# Altium PCB Anten-Tracker-PCB.PcbDoc
Units mm, origin at the board's own origin, x right, y up, seen from the top; angles counter-clockwise.
Board outline 70 x 70 mm, 4 copper layers (SIG/GND, POWER, GND, SIG/POW), stack 1.564 mm thick; 105 components, 76 nets, 398 pads, 175 vias.
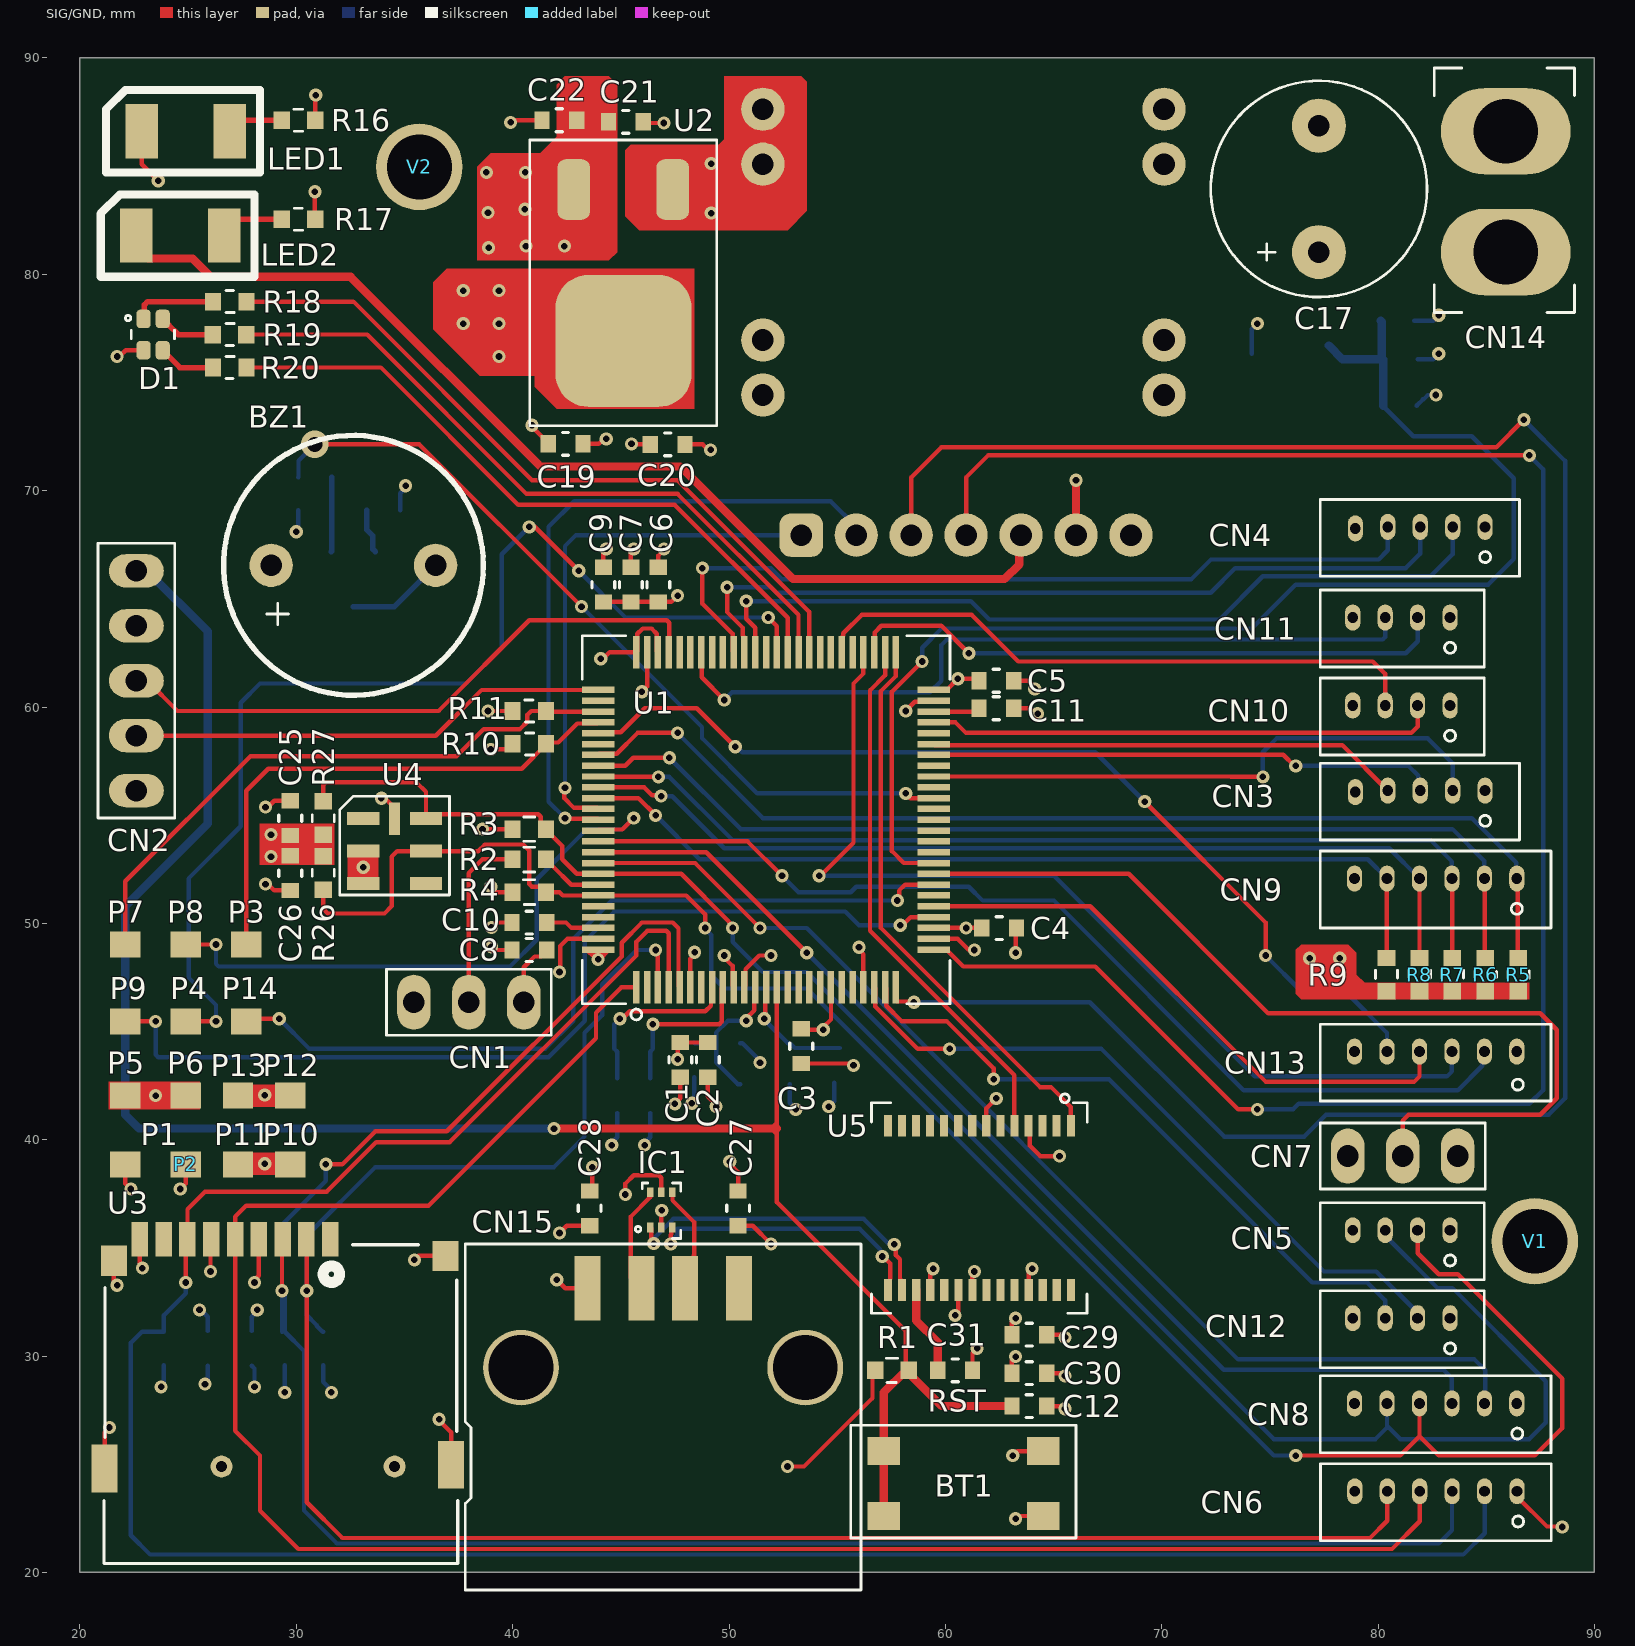
[diagram p0: SIG/GND view]
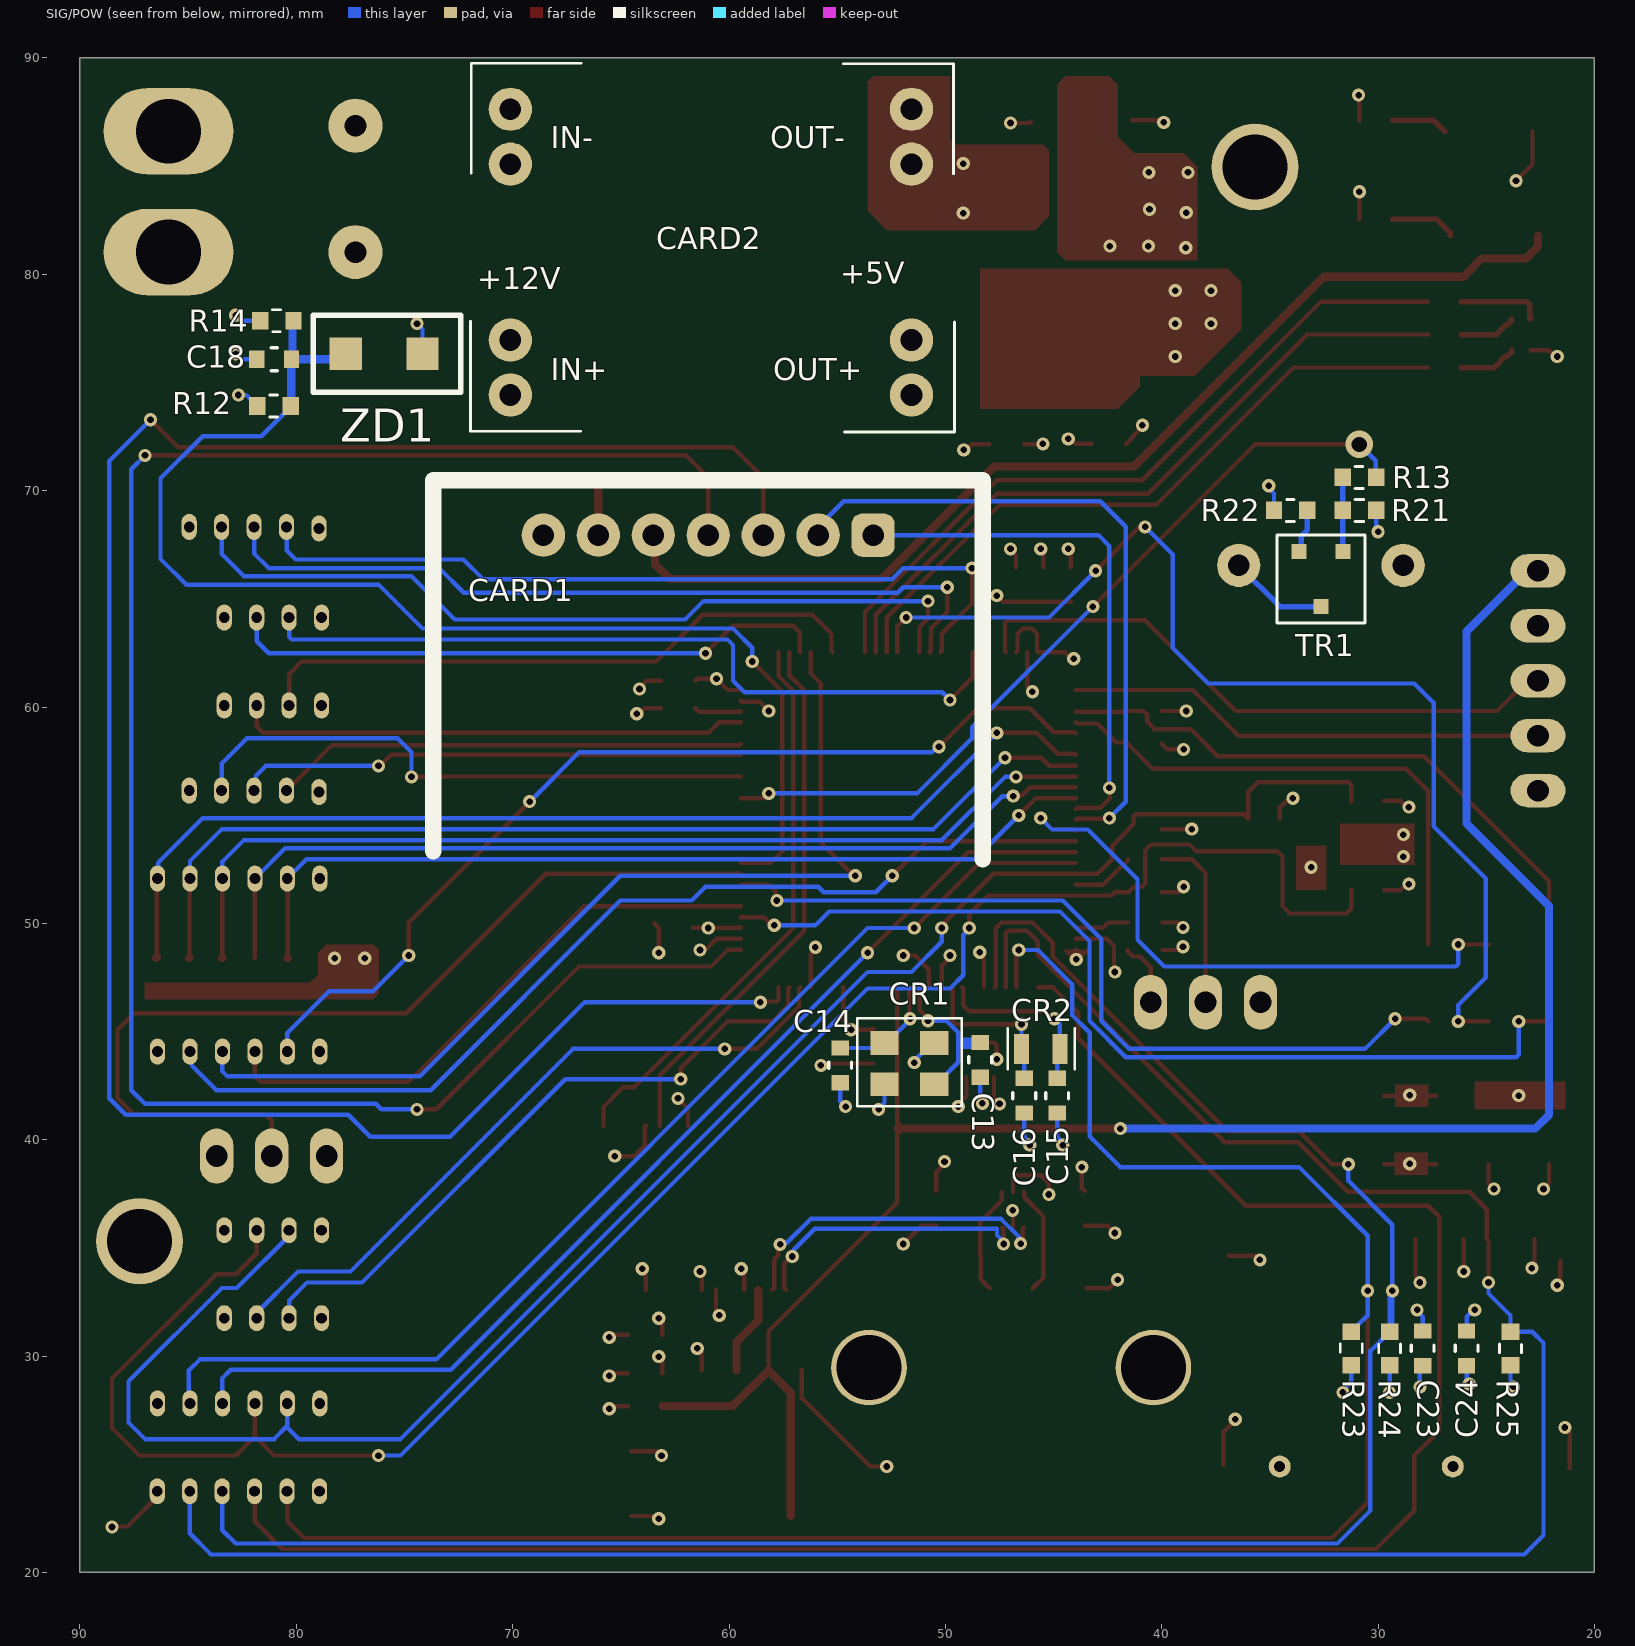
[diagram p1: SIG/POW view, seen from below]
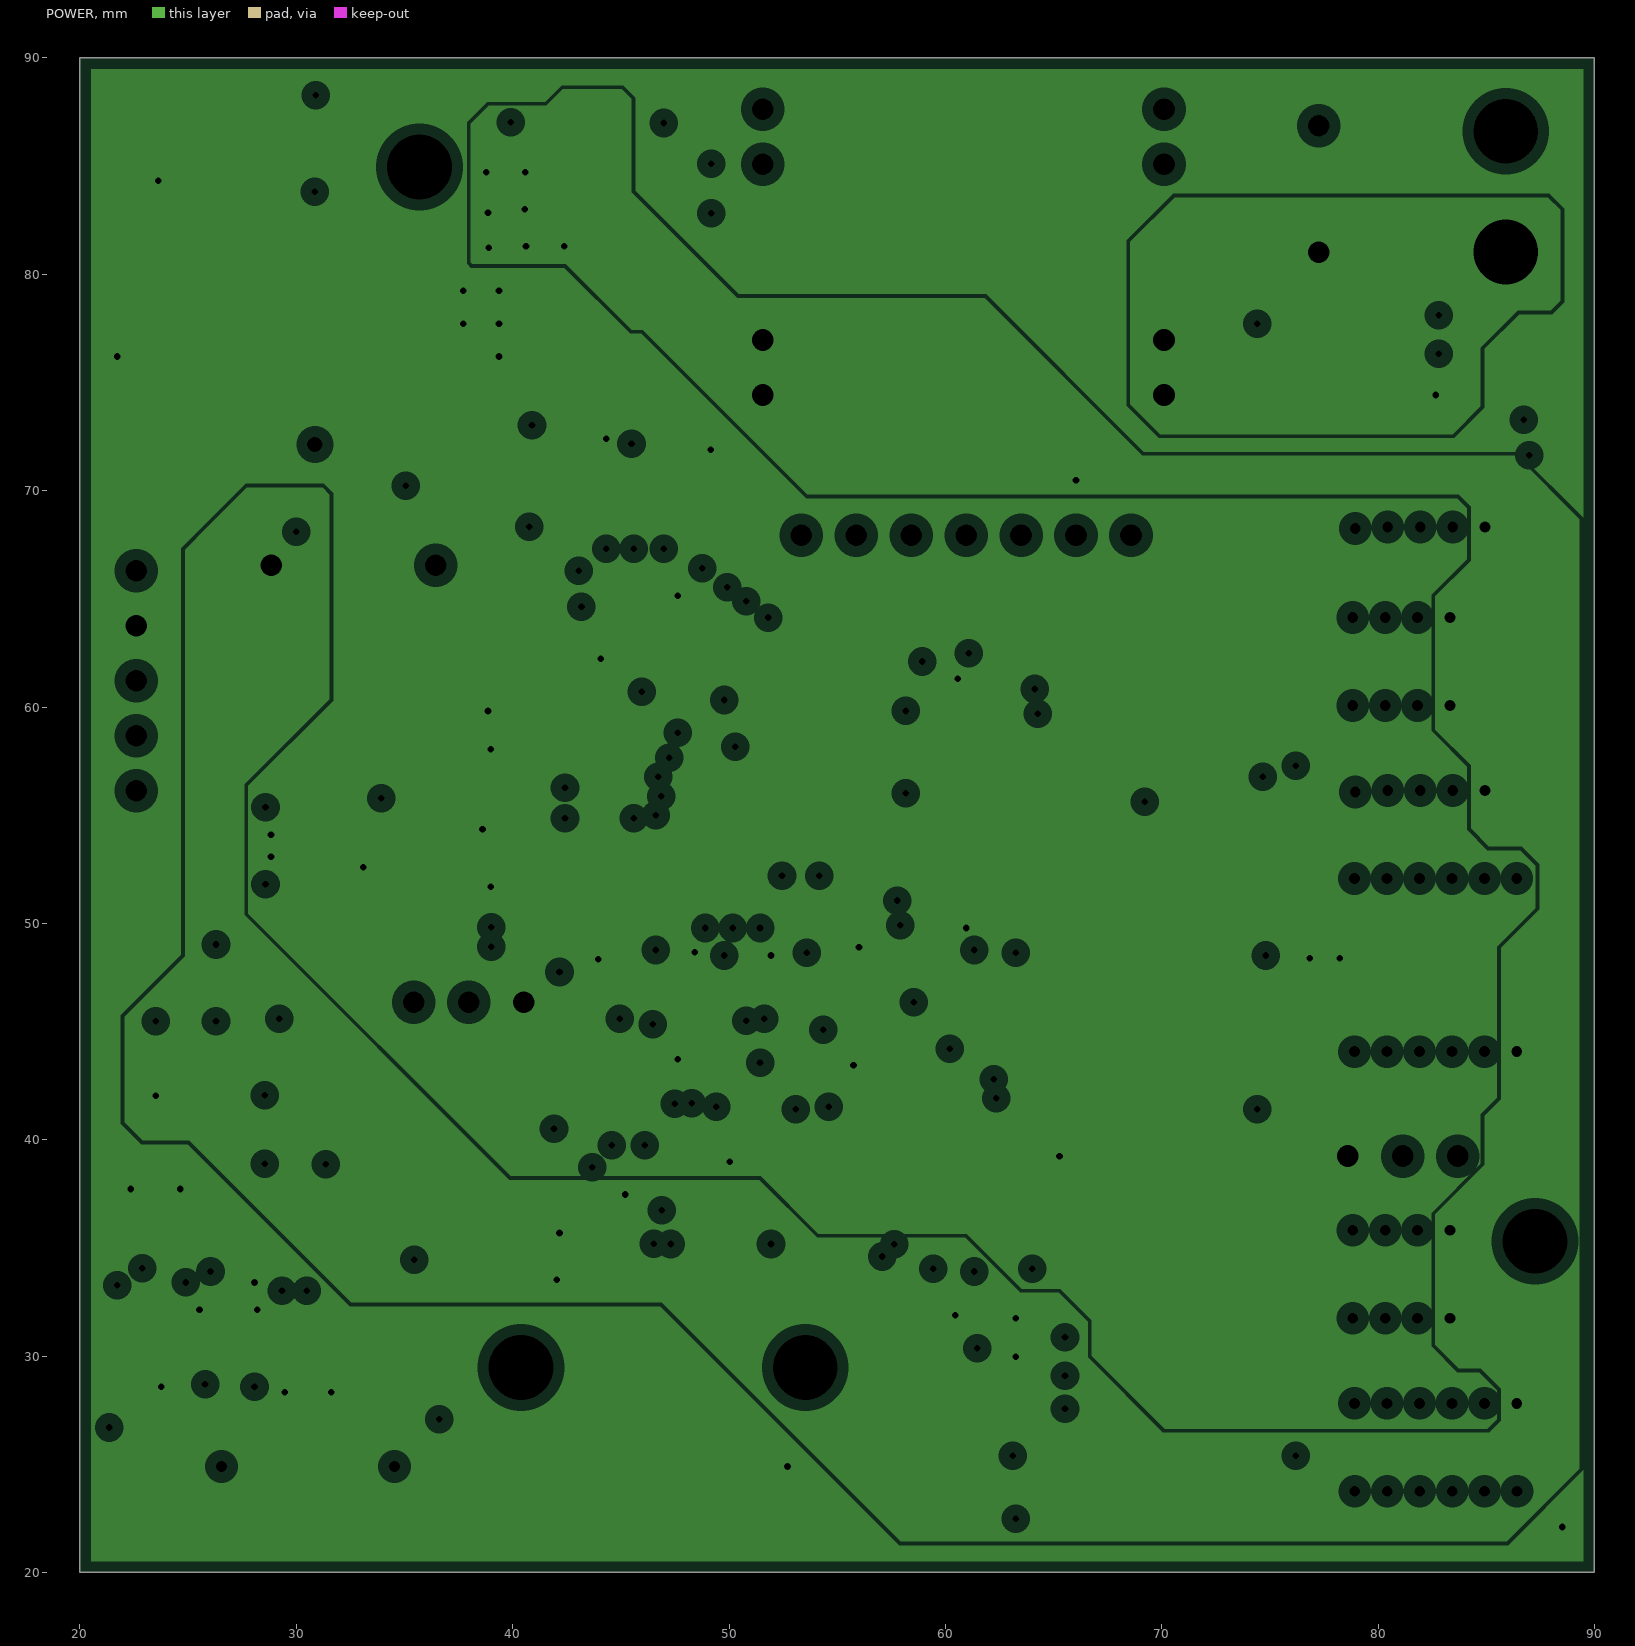
[diagram p2: POWER, clearances drawn from the general rule]
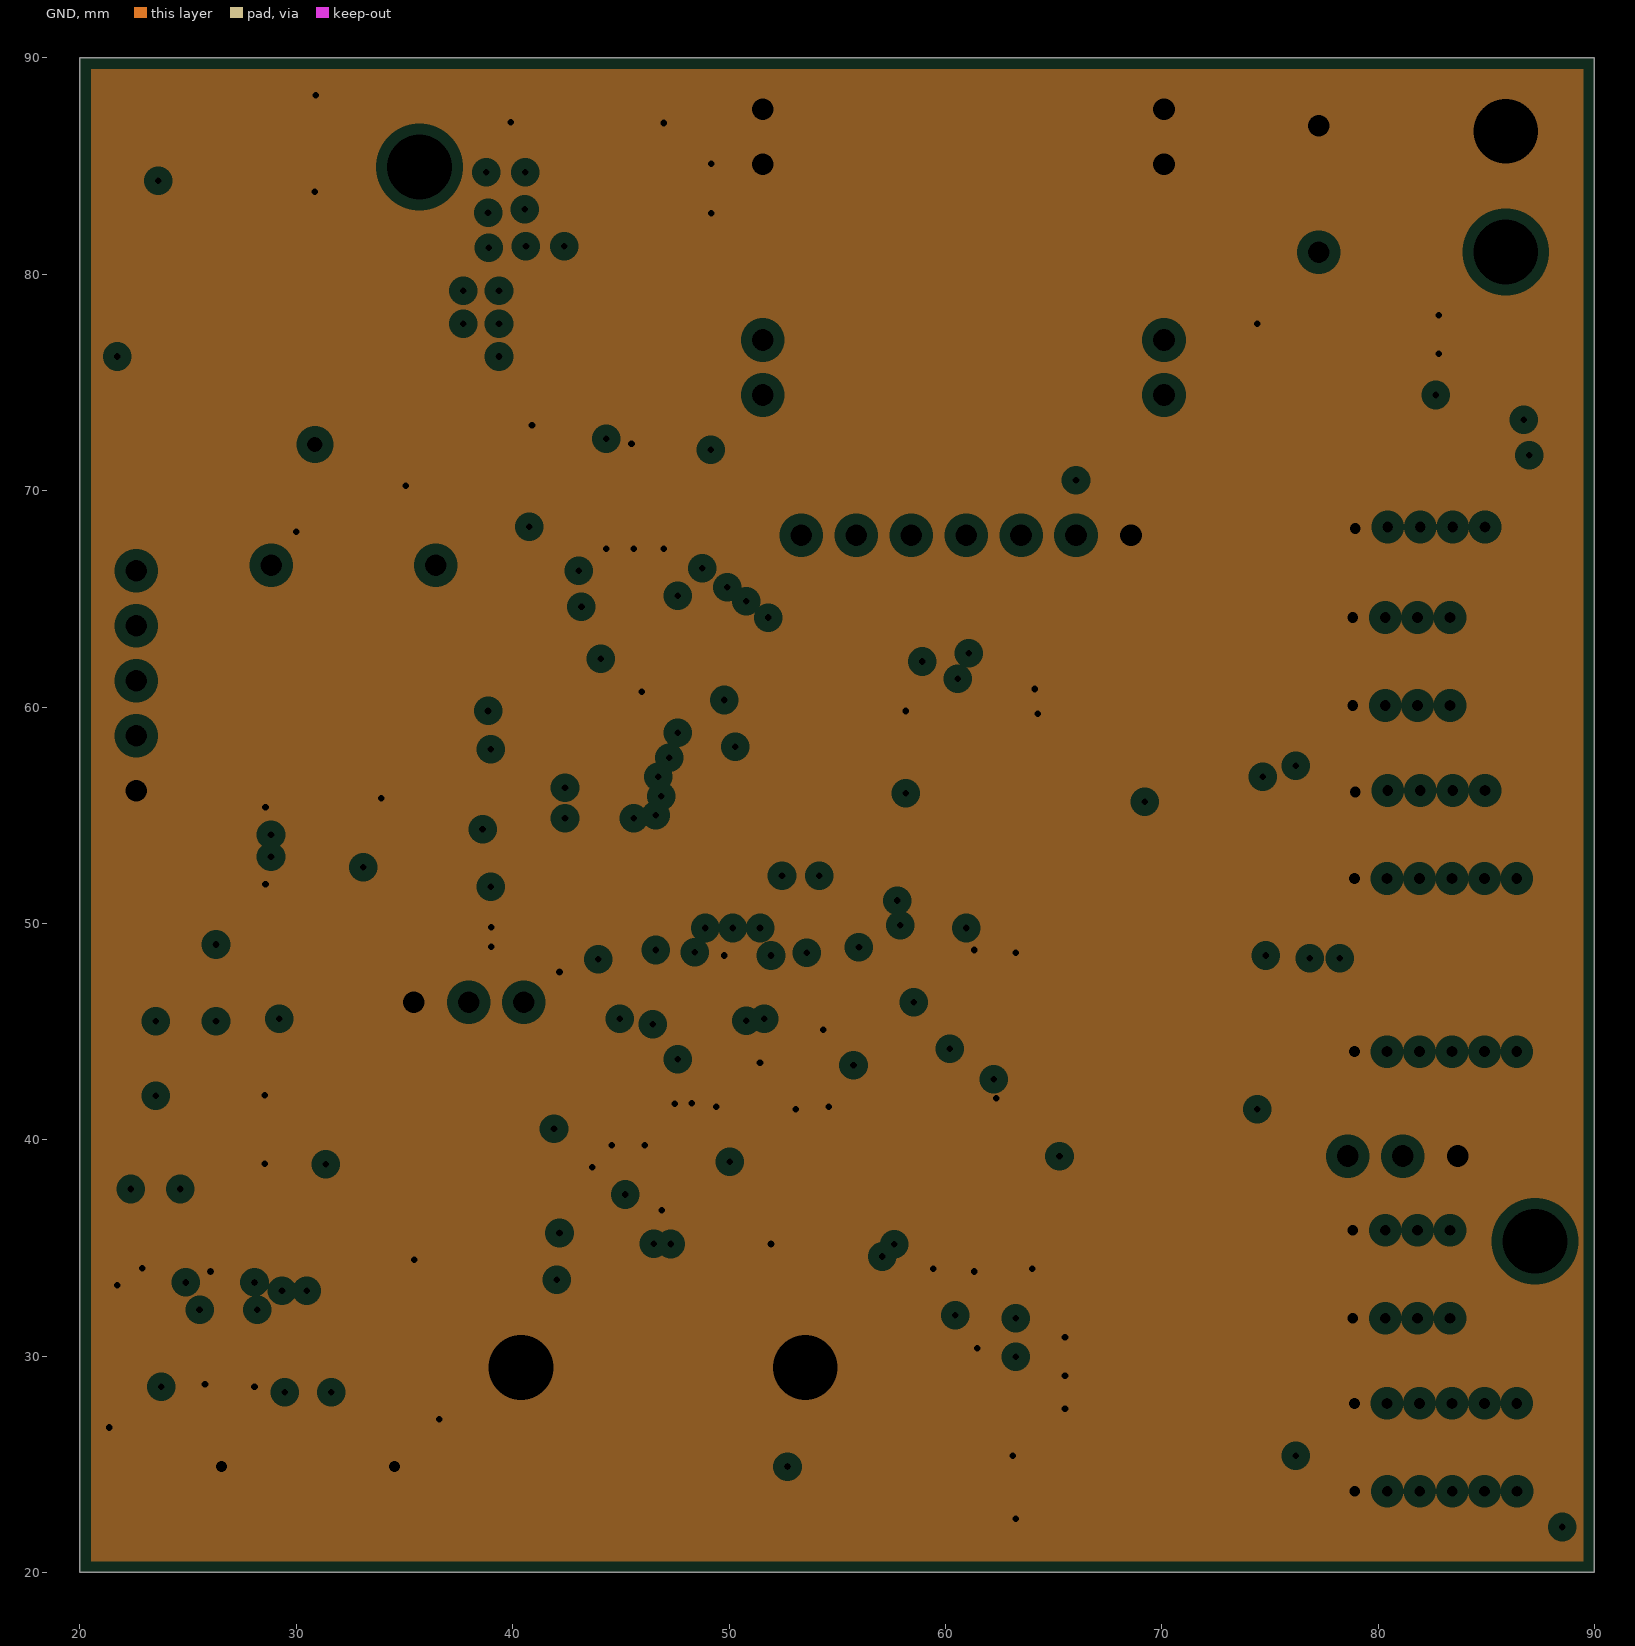
[diagram p3: GND, clearances drawn from the general rule]
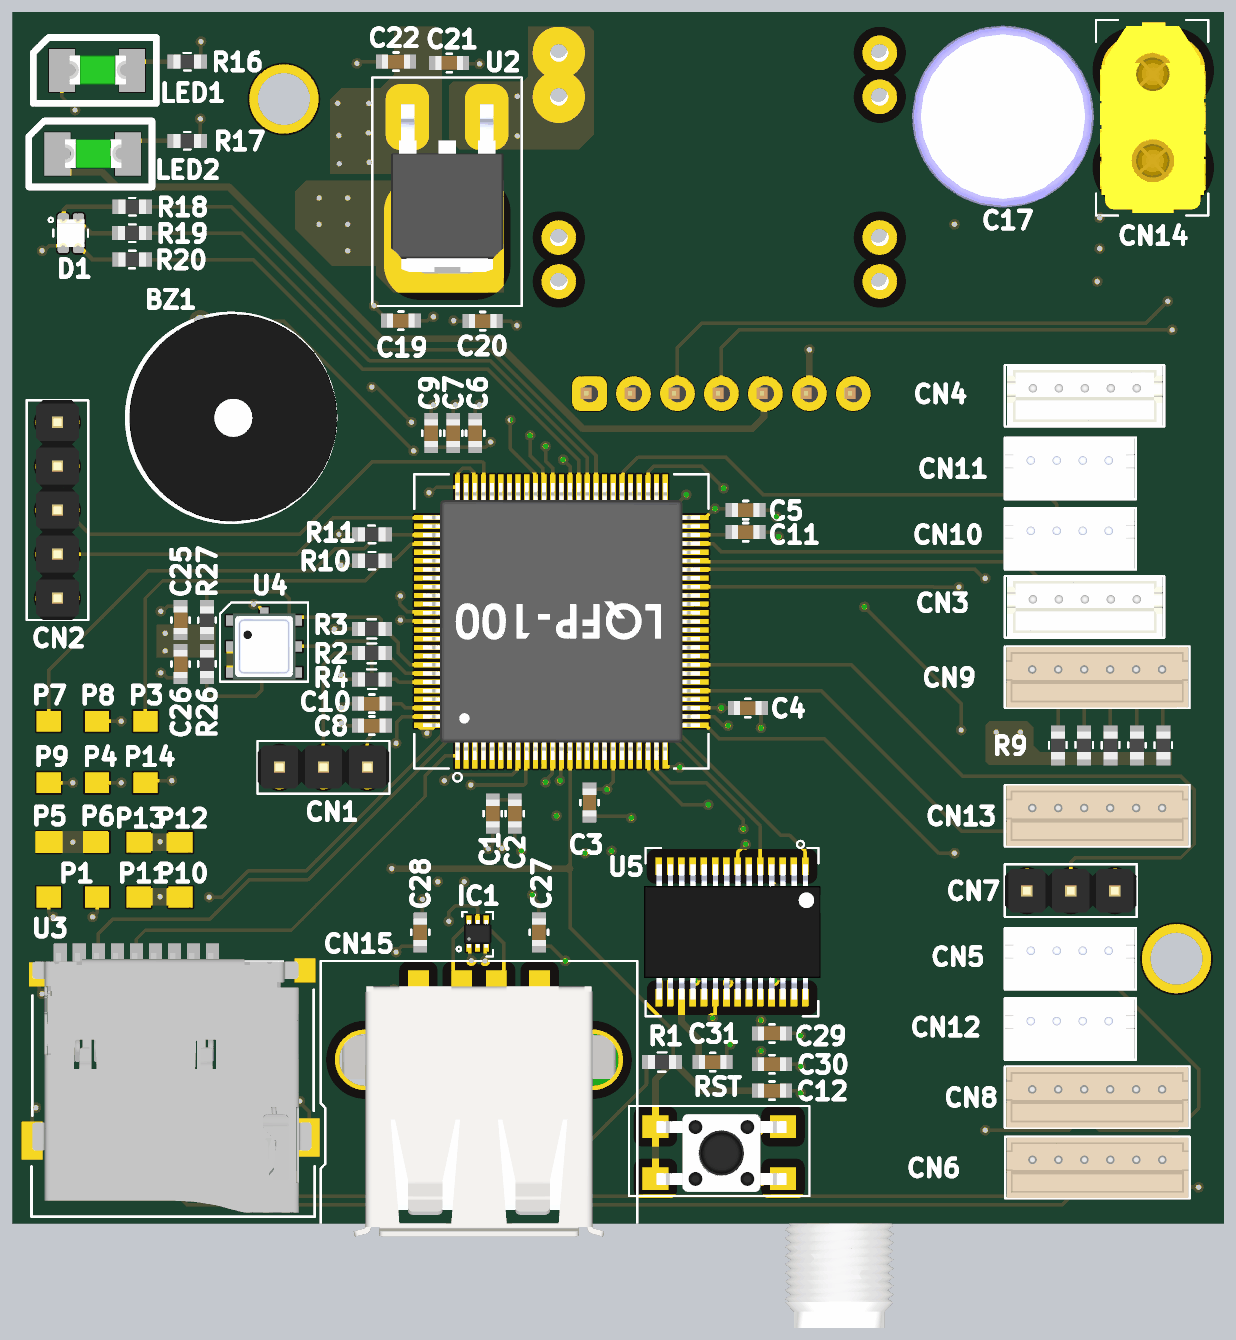
[diagram p4: 3D render of the assembled board from above, using the file's embedded part models]
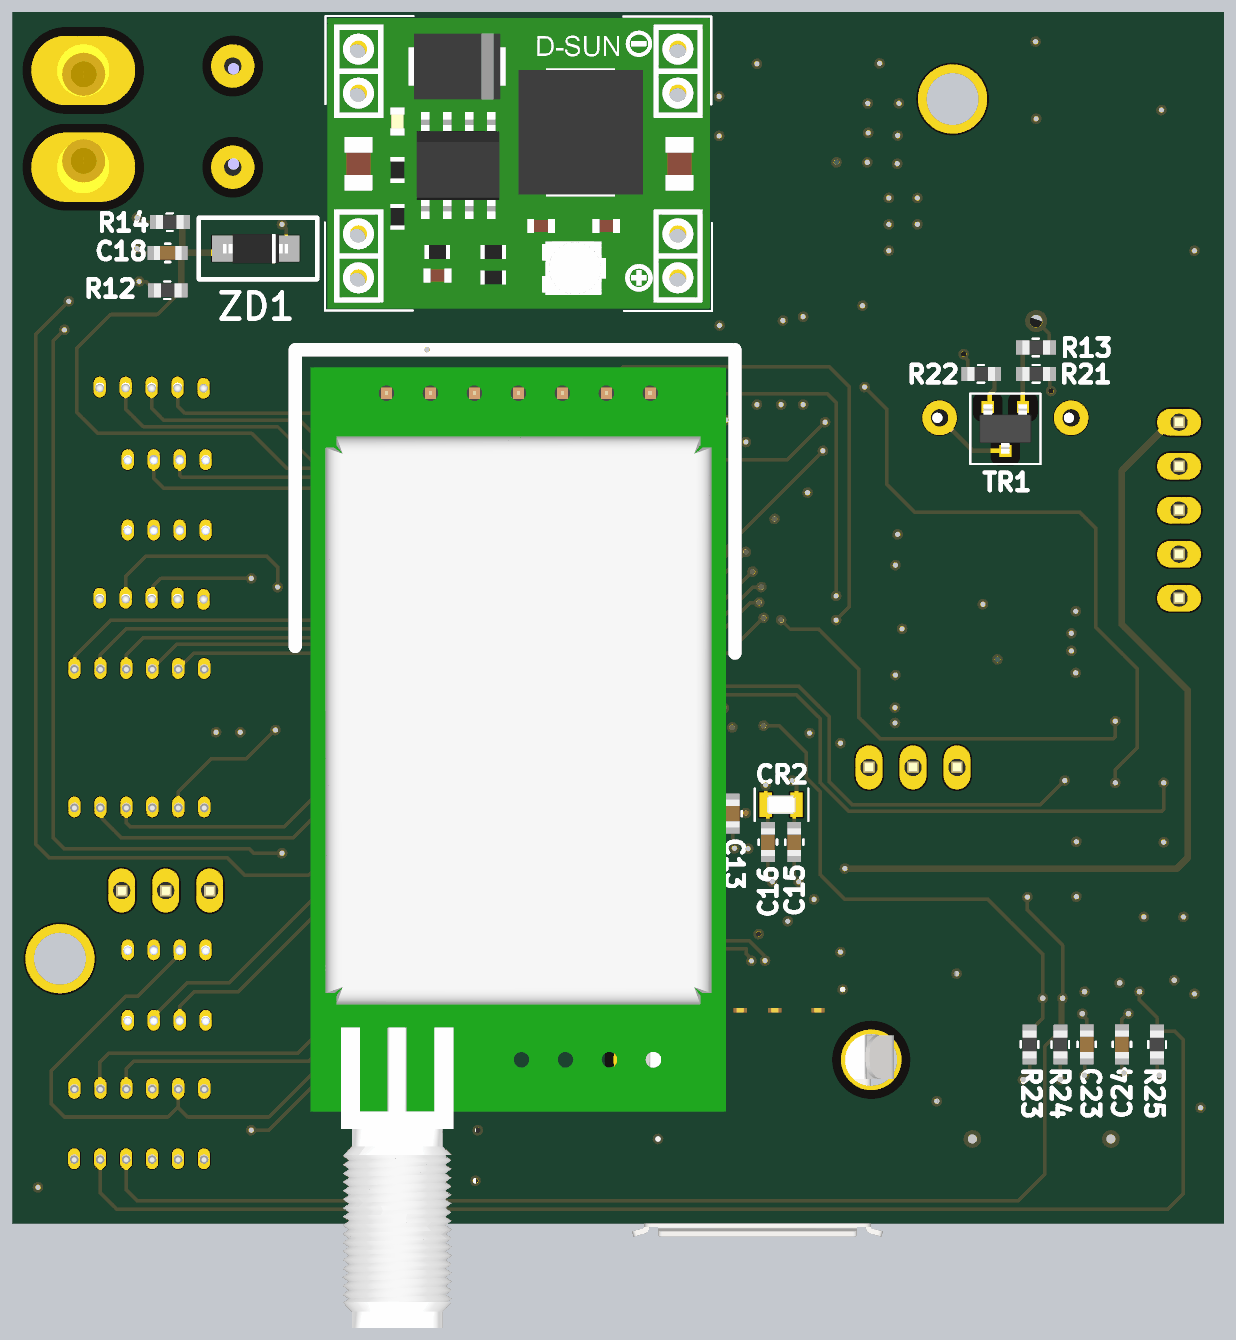
[diagram p5: 3D render of the assembled board from below, using the file's embedded part models]

## Layer stack, top to bottom
Top Solder: solder mask 0.1016, Solder Resist, Dk 3.5
SIG/GND: signal copper 0.0351
Dielectric 2: prepreg 0.0993, PP-006, Dk 4.1
POWER: plane copper 0.0152, net +3.3V
Dielectric 1: dielectric 1.2649, FR-4, Dk 4.8
GND: plane copper 0.0152, net GND
Dielectric 3: prepreg 0.0993, PP-006, Dk 4.1
SIG/POW: signal copper 0.0351
Bottom Solder: solder mask 0.1016, Solder Resist, Dk 3.5

## Board outline
20,20 20,90 90,90 90,20

## Design rules (kind name [scope] priority, off if disabled: settings)
Clearance Clearance_MCU [All vs WithinRoom('STM32')] p1: gap=0.152 ignorepadtopadclearanceinfootprint=FALSE
Clearance [All] p2: gap=0.178 ignorepadtopadclearanceinfootprint=FALSE
DiffPairsRouting [All] p1: maxlimit=0.254 minlimit=0.254 mostfreqgap=0.254 toplayer_minwidth=0.152 toplayer_maxwidth=0.381 toplayer_prefwidth=0.203 bottomlayer_minwidth=0.152 bottomlayer_maxwidth=0.381 bottomlayer_prefwidth=0.203 maxuncoupledlength=12.7
HoleSize [All] p1: absolutevalues=TRUE maxlimit=5.08 minlimit=0.025 maxpercent=80.000 minpercent=20.000
MinimumSolderMaskSliver [All] p1: minsoldermaskwidth=0
PlaneClearance [All] p1: clearance=0.508
PlaneConnect [All] p1: planeconnectstyle=Relief reliefexpansion=0.508 reliefentries=4 reliefconductorwidth=0.254 reliefairgap=0.254
PolygonConnect [All] p1: connectstyle=Relief reliefconductorwidth=0.254 reliefentries=4 polygonreliefangle="90 Angle" airgapwidth=0.254
RoutingVias [All] p1: holewidth=0.305 width=0.61 viastyle="Through Hole" minholewidth=0.152 minwidth=1.27 maxholewidth=7.62 maxwidth=10.16
SilkToSilkClearance [All] p1: silktosilkclearance=0.127
SilkToSolderMaskClearance [IsPad] p1: minsilkscreentomaskgap=0.127 clearancetoexposedcopper=TRUE
SolderMaskExpansion [All] p1: expansion=0.102 istentingtop=FALSE
UnRoutedNet [All] p1: checkbadconnections=TRUE
Width [All] p1: maxlimit=5.08 minlimit=0.203 preferedwidth=0.203 minimp=50.000000 maximp=50.000000 favimp=50.000000
22 further rules are at their usual default settings.

## Classes and differential pairs
net class USB': USB'_N USB'_P
net class USB: USB_N USB_P
component class STM32: BT1 C1 C2 C3 C4 C5 C6 C7 C8 C9 C12 C13 C14 C15 C16 CN1 CN2 CR1 CR2 P3 P7 R1 R2 R3 R4 U1
component class Harici_Birimler: CARD1 CN3 CN4 CN5 CN6 CN7 CN8 CN9 CN10 CN11 CN12 CN13 P1 P2 P3 P4 P6 P7 P8 P9 P10 P12 P13 P14 R5 R6 R7 R8 R9 R10 R11
component class Dahili_Birimler: BZ1 C17 C18 C19 C20 C21 C22 C23 C24 C25 C26 C27 C28 C29 C30 C31 CARD2 CN14 CN15 D1 IC1 LED1 LED2 R12 R13 R14 R16 R17 R18 R19 R20 R21 R22 R23 R24 R25 R26 R27 TR1 U2 U3 U4 U5 V1 V2 ZD1
differential pair USB': +USB'_P -USB'_N
differential pair USB: +USB_P -USB_N

## Components (designator, comment, footprint, x,y, rotation, side; value= is the part's Value field where it differs from the comment)
BT1 "5_mm_Buton" 5mm_buton 58.42,25.606 r0 top
BZ1 "5V buzzer" "5v buzer" 32.639,66.548 r0 top
C1 "CAP_0603" CAP_0603 47.752,43.688 r90 top value=100nF
C2 "CAP_0603" CAP_0603 49.022,43.688 r90 top value=100nF
C3 "CAP_0603" CAP_0603 53.34,44.323 r270 top value=100nF
C4 "CAP_0603" CAP_0603 62.484,49.784 r180 top value=100nF
C5 "CAP_0603" CAP_0603 62.357,61.214 r180 top value=100nF
C6 "CAP_0603" CAP_0603 46.736,65.659 r270 top value=100nF
C7 "CAP_0603" CAP_0603 45.466,65.659 r270 top value=100nF
C8 "CAP_0603" CAP_0603 40.767,48.768 r0 top value=100nF
C9 "CAP_0603" CAP_0603 44.196,65.659 r270 top value=4.7uF
C10 "CAP_0603" CAP_0603 40.767,50.038 r0 top value=2.2uF
C11 "CAP_0603" CAP_0603 62.357,59.944 r180 top value=2.2uF
C12 "CAP_0603" CAP_0603 63.881,27.686 r180 top value=100nF
C13 "CAP_0603" CAP_0603 48.387,43.688 r90 bottom value=5.6pF
C14 "CAP_0603" CAP_0603 54.864,43.434 r90 bottom value=5.6pF
C15 "CAP_0603" CAP_0603 44.831,42.037 r270 bottom value=5.1pF
C16 "CAP_0603" CAP_0603 46.355,42.037 r270 bottom value=5.1pF
C17 "CAP_Elec" CAP_Elec 77.394,83.82 r90 top value=100uF
C18 "CAP_0603" CAP_0603 81.026,76.073 r180 bottom value=1uF
C19 "CAP_0603" CAP_0603 42.443,72.161 r0 top value=10uF
C20 "CAP_0603" CAP_0603 47.168,72.136 r0 top value=1nF
C21 "CAP_0603" CAP_0603 45.237,87.046 r180 top value=10uF
C22 "CAP_0603" CAP_0603 42.164,87.122 r0 top value=1nF
C23 "CAP_0603" CAP_0603 27.94,30.353 r90 bottom value=10uF
C24 "CAP_0603" CAP_0603 25.908,30.353 r90 bottom value=100nF
C25 "CAP_0603" CAP_0603 29.718,54.864 r270 top value=100nF
C26 "CAP_0603" CAP_0603 29.718,52.324 r90 top value=100nF
C27 "CAP_0603" CAP_0603 50.419,36.83 r90 top value=10nF
C28 "CAP_0603" CAP_0603 43.561,36.83 r270 top value=100nF
C29 "CAP_0603" CAP_0603 63.881,30.988 r180 top value=10nF
C30 "CAP_0603" CAP_0603 63.881,29.21 r180 top value=4.7uF
C31 "CAP_0603" CAP_0603 60.452,29.337 r180 top value=100nF
CARD1 "LORA_e22" "LORA e22" 53.34,67.945 r270 bottom
CARD2 "MP1584EN" MP1584 60.836,81.026 r180 bottom
CN1 "Jumper" 3_PIN_HEADER 40.513,46.355 r180 top
CN2 "5_Pin_Header" 5_PIN_HEADER 22.606,66.294 r270 top
CN3 "jst_conn_5_pin" 64800611622_CONN_5_PIN 84.951,56.134 r180 top
CN4 "jst_conn_5_pin" 64800611622_CONN_5_PIN 84.951,68.326 r180 top
CN5 "jst_conn_4_pin" "64800611622 _conn_4_pin" 81.831,35.814 r180 top
CN6 "jst_conn_6_pin" 64800611622_conn_6_pin 82.677,23.749 r180 top
CN7 "3_Pin_Header" 3_PIN_HEADER 78.601,39.243 r0 top
CN8 "jst_conn_6_pin" 64800611622_conn_6_pin 82.665,27.813 r180 top
CN9 "jst_conn_6_pin" 64800611622_conn_6_pin 82.665,52.07 r180 top
CN10 "jst_conn_4_pin" "64800611622 _conn_4_pin" 81.831,60.071 r180 top
CN11 "jst_conn_4_pin" "64800611622 _conn_4_pin" 81.831,64.135 r180 top
CN12 "jst_conn_4_pin" "64800611622 _conn_4_pin" 81.831,31.75 r180 top
CN13 "jst_conn_6_pin" 64800611622_conn_6_pin 82.665,44.069 r180 top
CN14 "XT30" XT30 85.903,83.82 r0 top
CN15 "USB_A" USB_A 46.956,29.464 r0 top
CR1 "RH100" RH100 50.513,42.565 r0 bottom
CR2 "RT2012" RT2012 44.831,44.196 r0 bottom
D1 "SMD_RGB" LED_LTST-C19HE1WT 23.368,77.216 r0 top
IC1 "NUF2042XV6T1G" SOT-563-6 46.371,36.22 r0 top
LED1 "Kırmızı" 1206_LED 22.86,86.614 r0 top
LED2 "Yeşil" 1206_LED 22.606,81.788 r0 top
P1 "ped" ped 22.098,38.862 r0 top
P2 "ped" ped 24.892,38.862 r0 top
P3 "ped" ped 27.686,49.022 r0 top
P4 "ped" ped 24.892,45.466 r0 top
P5 "ped" ped 22.098,42.037 r0 top
P6 "ped" ped 24.892,42.037 r0 top
P7 "ped" ped 22.098,49.022 r0 top
P8 "ped" ped 24.892,49.022 r0 top
P9 "ped" ped 22.098,45.466 r0 top
P10 "ped" ped 29.718,38.862 r0 top
P11 "ped" ped 27.305,38.862 r180 top
P12 "ped" ped 29.718,42.037 r0 top
P13 "ped" ped 27.305,42.037 r0 top
P14 "ped" ped 27.686,45.466 r180 top
R1 "RES_0603" RES_0603 57.531,29.337 r0 top value=1.5K
R2 "RES_0603" RES_0603 40.767,52.959 r180 top value=10K
R3 "RES_0603" RES_0603 40.767,54.356 r180 top value=10K
R4 "RES_0603" RES_0603 40.767,51.435 r180 top value=10K
R5 "RES_0603" RES_0603 86.487,47.625 r270 top value=10K
R6 "RES_0603" RES_0603 84.963,47.625 r270 top value=10K
R7 "RES_0603" RES_0603 83.439,47.625 r270 top value=10K
R8 "RES_0603" RES_0603 81.915,47.625 r270 top value=10K
R9 "RES_0603" RES_0603 80.391,47.625 r270 top value=10K
R10 "RES_0603" RES_0603 40.767,58.293 r180 top value=10K
R11 "RES_0603" RES_0603 40.767,59.817 r180 top value=10K
R12 "RES_0603" RES_0603 81.026,73.914 r180 bottom value=10K
R13 "RES_0603" RES_0603 30.861,70.612 r0 bottom value=10K
R14 "RES_0603" RES_0603 80.899,77.851 r180 bottom value=2K
R16 "RES_0603" RES_0603 30.099,87.122 r180 top value=100-200Ω
R17 "RES_0603" RES_0603 30.099,82.55 r180 top value=330Ω
R18 "RES_0603" RES_0603 26.924,78.74 r180 top value=100-200Ω
R19 "RES_0603" RES_0603 26.914,77.216 r180 top value=100-200Ω
R20 "RES_0603" RES_0603 26.924,75.692 r180 top value=100-200Ω
R21 "RES_0603" RES_0603 30.861,69.088 r180 bottom value=10K
R22 "RES_0603" RES_0603 34.036,69.088 r180 bottom value=10K
R23 "RES_0603" RES_0603 31.242,30.353 r270 bottom value=10K
R24 "RES_0603" RES_0603 29.464,30.353 r270 bottom value=10K
R25 "RES_0603" RES_0603 23.876,30.353 r270 bottom value=10K
R26 "RES_0603" RES_0603 31.242,52.324 r90 top value=4.7K
R27 "RES_0603" RES_0603 31.242,54.864 r270 top value=4.7K
TR1 "BC846" SOT-23 32.639,66.929 r0 bottom
U1 "STM32H523VET6" LQFP100 51.714,54.788 r0 top
U2 "LD1086DT33TR" DPAK 42.824,83.922 r180 top
U3 "112J-TDAR-R01" 112J-TDAR-R01_ATT 31.569,35.392 r0 top
U4 "BMP180" BMP180 34.544,53.34 r90 top
U5 "FT232" SSOP-28 65.802,40.64 r180 top
V1 "Vida Deliği 3mm" m3_vide_deliği 87.249,35.306 r0 top
V2 "Vida Deliği 3mm" m3_vide_deliği 35.687,84.963 r0 top
ZD1 "3.3V Zener" SOD-123 73.914,76.327 r0 bottom

## Footprints (in the part's own frame and the unit in brackets; to place one, negate y for a bottom-side part, rotate by r counter-clockwise, add the part's x,y. Pads: shape width x height; smd on the part's side, far side on the other; paste and mask are expansions set on the pad)
3_PIN_HEADER [mm]
  oval 1.54x2.54 hole 1 paste-1 mask+0.102: 1(0,0) 2(2.54,0) 3(5.08,0)
  silkscreen extent -1.27,-1.52 6.35,1.52, body extent -1.27,-1.27 6.35,1.23, height 10.54
5_PIN_HEADER [mm]
  oval 1.54x2.54 hole 1 paste-1 mask+0.102: 1(0,0) 2(2.54,0) 3(5.08,0) 4(7.62,0) 5(10.16,0)
  silkscreen extent -1.27,-1.78 11.43,1.78, body extent -1.27,-1.25 11.44,1.25, height 10.54
5mm_buton [mm]
  rect 1.5x1.3 smd paste-1 mask+0.508: 1(-1.27,0) 2(6.096,0) 3(6.096,-3) 4(-1.27,-3)
  silkscreen extent -2.79,-4.02 7.62,1.19, body extent -1.21,-3.77 6.29,0.73, height 4.2
"5v buzer" [mm]
  round 2 hole 1 mask+0.05: 1(-3.8,0) 2(3.8,0)
  silkscreen extent -6,-6 6.01,6, body extent -5.87,-6 6.12,6, height 10
112J-TDAR-R01_ATT [mil]
  rect 30x63 smd paste+0 mask+0: 1(0,0) 2(-43.31,0) 3(-86.61,0) 4(-129.92,0) 5(-173.23,0) 6(-216.54,0) 7(-259.84,0) 8(-303.15,0) 9(-346.46,0)
  round 40 / inner round 60 / far side round 40 hole 20 paste-20 mask-20: 10(-197.83,-413.39) 11(117.13,-413.39)
  rect 47x55 smd paste-27.5 mask+0: 12(-393.7,-39) 13(210,-30)
  rect 47.24x86.61 smd paste-43.31 mask+0: 14(-410.43,-416.96) 15(220,-410)
  silkscreen extent -412,-590 232,-10, body extent -410,-581 224,10, height 73
1206_LED [mm]
  rect 1.5x2.5 smd mask+0.05: 1(0,0) 2(4.064,0)
  silkscreen extent -1.65,-1.91 5.46,1.91, body extent 0.44,-0.8 3.71,0.85, height 0.9
"64800611622 _conn_4_pin" [mm]
  oval 0.7x1.2 hole 0.5 mask+0.05: 1(-1.5,0) 2(0,0) 3(1.5,0) 4(3,0)
  silkscreen extent -3.08,-1.27 4.5,2.29, body extent -3,-1.25 4.5,2.25, height 4.5
64800611622_CONN_5_PIN [mm]
  oval 0.7x1.2 hole 0.5 mask+0.05: 1(0,0) 2(1.5,0) 3(3,0) 4(4.5,0) 5(6,0.069)
  silkscreen extent -1.58,-1.27 7.62,2.29, body extent -1.5,-1.23 7.5,2.27, height 4.5
64800611622_conn_6_pin [mm]
  oval 0.7x1.2 hole 0.5 mask+0.05: 1(-3.75,0) 2(-2.25,0) 3(-0.75,0) 4(0.75,0) 5(2.25,0) 6(3.75,0)
  silkscreen extent -5.33,-1.27 5.33,2.29, body extent -5.25,-1.24 5.25,2.26, height 4.75
BMP180 [mm]
  rect 0.6x1.5 smd: 1(1.5,1.45) 2(0,1.45) 3(-1.5,1.45) 4(-1.5,-1.45) 5(0,-1.45) 6(1.5,-1.45)
  rect 1.5x0.5 smd: 7(1.5,0)
  silkscreen extent -2.03,-2.54 2.54,2.54, body extent -1.9,-1.8 1.9,1.8, height 1
CAP_0603 [mm]
  rect 0.706x0.8 smd paste+0 mask+0: 1(-0.803,0) 2(0.803,0)
  silkscreen extent -0.14,-0.53 0.14,0.53, body extent -0.8,-0.4 0.8,0.4, height 0.5
CAP_Elec [mm]
  round 2.5 hole 1 paste-1 mask+0.508: 1(-2.794,0.127) 2(3.048,0.127)
  silkscreen extent -4.87,-4.87 5.13,5.12, body extent -5.12,-5.08 5.37,5.42, height 17.16
DPAK [mm]
  rrect50% 1.5x2.8 smd paste-1 mask+0.508: 1(0,0) 2(-4.572,0)
  rrect50% 6.3x6.1 smd paste-1 mask+0.508: 3(-2.3,7)
  silkscreen extent -6.6,-2.29 2.03,10.92, body extent -5.55,-0.76 0.95,8.96, height 2.4
LED_LTST-C19HE1WT [mm]
  rrect50% 0.65x0.85 smd: 1(-0.425,0.725) 2(0.457,0.721) 3(0.457,-0.726) 4(-0.425,-0.725)
  silkscreen extent -1.27,-0.2 1,0.89, body extent -0.8,-0.8 0.8,0.8, height 0.35
"LORA e22" [mm]
  rrect50% 2x2 hole 1 mask+0.05: 1(0,0)
  round 2 hole 1 mask+0.05: 2(0,-2.54) 3(0,-5.08) 4(0,-7.62) 5(0,-10.16) 6(0,-12.7) 7(0,-15.24)
  silkscreen extent -2.54,-20.32 14.99,5.08, body extent -1.52,-19.43 53.98,4.57, height 8.1
LQFP100 [mm]
  rect 0.3x1.5 smd paste-1 mask+0.102: 1(-6,-7.75) 2(-5.5,-7.75) 3(-5,-7.75) 4(-4.5,-7.75) 5(-4,-7.75) 6(-3.5,-7.75) 7(-3,-7.75) 8(-2.5,-7.75) 9(-2,-7.75) 10(-1.5,-7.75) 11(-1,-7.75) 12(-0.5,-7.75) 13(0,-7.75) 14(0.5,-7.75) 15(1,-7.75) 16(1.5,-7.75) 17(2,-7.75) 18(2.5,-7.75) 19(3,-7.75) 20(3.5,-7.75) 21(4,-7.75) 22(4.5,-7.75) 23(5,-7.75) 24(5.5,-7.75) 25(6,-7.75) 51(6,7.75) 52(5.5,7.75) 53(5,7.75) 54(4.5,7.75) 55(4,7.75) 56(3.5,7.75) 57(3,7.75) 58(2.5,7.75) 59(2,7.75) 60(1.5,7.75) 61(1,7.75) 62(0.5,7.75) 63(0,7.75) 64(-0.5,7.75) 65(-1,7.75) 66(-1.5,7.75) 67(-2,7.75) 68(-2.5,7.75) 69(-3,7.75) 70(-3.5,7.75) 71(-4,7.75) 72(-4.5,7.75) 73(-5,7.75) 74(-5.5,7.75) 75(-6,7.75)
  rect 1.5x0.3 smd paste-1 mask+0.102: 26(7.75,-6) 27(7.75,-5.5) 28(7.75,-5) 29(7.75,-4.5) 30(7.75,-4) 31(7.75,-3.5) 32(7.75,-3) 33(7.75,-2.5) 34(7.75,-2) 35(7.75,-1.5) 36(7.75,-1) 37(7.75,-0.5) 38(7.75,0) 39(7.75,0.5) 40(7.75,1) 41(7.75,1.5) 42(7.75,2) 43(7.75,2.5) 44(7.75,3) 45(7.75,3.5) 46(7.75,4) 47(7.75,4.5) 48(7.75,5) 49(7.75,5.5) 50(7.75,6) 76(-7.75,6) 77(-7.75,5.5) 78(-7.75,5) 79(-7.75,4.5) 80(-7.75,4) 81(-7.75,3.5) 82(-7.75,3) 83(-7.75,2.5) 84(-7.75,2) 85(-7.75,1.5) 86(-7.75,1) 87(-7.75,0.5) 88(-7.75,0) 89(-7.75,-0.5) 90(-7.75,-1) 91(-7.75,-1.5) 92(-7.75,-2) 93(-7.75,-2.5) 94(-7.75,-3) 95(-7.75,-3.5) 96(-7.75,-4) 97(-7.75,-4.5) 98(-7.75,-5) 99(-7.75,-5.5) 100(-7.75,-6)
  silkscreen extent -8.5,-9.25 8.5,8.5, body extent -8,-8 8,8, height 1.65
m3_vide_deliği [mm]
  round 4 hole 3 paste-1 mask+0.102: 1(0,0)
MP1584 [mm]
  round 2 hole 1 paste-1 mask+0.508: 1(-9.271,6.604) 2(-9.271,4.064) 3(-9.271,-4.064) 4(-9.271,-6.604) 5(9.271,6.604) 6(9.271,4.064) 7(9.271,-4.064) 8(9.271,-6.604)
  silkscreen extent -11.11,-8.32 11.26,8.73, body extent -10.97,-8.17 11.13,8.63, height 4.1
ped [mm]
  rect 1.4x1.2 smd paste-1 mask+0.102: 1(0,0)
RES_0603 [mil]
  rect 29.78x32 smd paste+0 mask+0: 1(-30.39,0) 2(30.39,0)
  silkscreen extent -10,-22 10,22, body extent -31,-16 31,16, height 28
RH100 [mm]
  rect 1.3x1.1 smd paste-1 mask+0.508: 1(0,0) 2(2.3,0) 3(2.3,-1.9) 4(0,-1.9)
  silkscreen extent -1.27,-3.05 3.56,1.02, body extent -0.46,-2.27 2.74,0.23, height 0.66
RT2012 [mm]
  rect 0.7x1.4 smd paste-1 mask+0.102: 1(-0.127,0) 2(1.651,0)
  silkscreen extent -0.81,-0.95 2.29,0.94, body extent -0.06,-0.53 1.59,0.53, height 0.5
SOD-123 [mm]
  rect 1.5x1.5 smd mask+0.05: 1(0.254,0) 2(3.81,0)
  silkscreen extent -1.52,-1.78 5.31,1.78, body extent 0.16,-0.85 3.91,0.85, height 1.2
SOT-23 [mm]
  rect 0.7x0.7 smd paste-1 mask+0.508: 1(-1.016,-0.254) 2(1.016,-0.254) 3(0,2.286)
  silkscreen extent -2.03,-1.02 2.03,3.05, body extent -1.5,-0.4 1.5,2.43, height 1.2
SOT-563-6 [mm]
  rect 0.3x0.45 smd paste-1 mask+0.102: 1(0,-0.279) 2(0.5,-0.279) 3(1,-0.279) 4(1,1.35) 5(0.5,1.35) 6(0,1.35)
  silkscreen extent -0.7,-0.79 1.4,1.78, body extent -0.29,-0.28 1.31,1.32, height 0.53
SSOP-28 [mm]
  rect 0.38x1 smd paste-1 mask+0.508: 1(0,0) 2(0.658,0) 3(1.308,0) 4(1.958,0) 5(2.608,0) 6(3.258,0) 7(3.908,0) 8(4.558,0) 9(5.208,0) 10(5.858,0) 11(6.508,0) 12(7.158,0) 13(7.808,0) 14(8.458,0) 15(8.45,7.585) 16(7.8,7.585) 17(7.15,7.585) 18(6.5,7.585) 19(5.85,7.585) 20(5.2,7.585) 21(4.55,7.585) 22(3.9,7.585) 23(3.25,7.585) 24(2.6,7.585) 25(1.95,7.585) 26(1.3,7.585) 27(0.65,7.585) 28(0,7.585)
  silkscreen extent -0.76,-1.47 9.22,8.66, body extent -0.89,-0.11 9.31,7.69, height 1.96
USB_A [mm]
  rect 1.2x3 smd paste-1 mask+0.508: 1(-3.5,3.67) 2(-1,3.67) 3(1,3.67) 4(3.5,3.67)
  round 3.5 hole 3 paste-1 mask+0.508: 5(-6.57,0) 5(6.57,0)
  silkscreen extent -9.14,-10.28 9.14,5.71, body extent -7.89,-10.21 7.89,4.24, height 7.55
XT30 [mm]
  oval 6x4 hole 3 paste-1 mask+0.508: 1(0,2.794) 2(0,-2.794)
  silkscreen extent -3.3,-5.59 3.17,5.71, body extent -3.07,-5.43 3.03,5.57, height 12.9

## Part data
BZ1: library part Buzzer
CARD2: library part MP1584EN_kartı
CN1 CN7: library part 3_Pin_2.54mm
CN2: library part 5_Pin_2.54mm
CN3 CN4: library part 64800611622_conn_5_pin
CN5 CN10 CN11 CN12: library part "64800611622 _conn_4_pin"
CN6 CN8 CN9 CN13: library part "64800611622 _conn_6_pin"
CR1: library part 16_MHz_Crystal
CR2: library part RT2012_Kristal
D1: library part LTST-C19HE1WT, "Red, Green, Blue (RGB) 624nm Red, 525nm Green, 470nm Blue LED Indication - Discrete 2.1V Red, 3.35V Green, 3.35V Blue 0606 (1616 Metric)", Package="0606 Lite-On", Check_prices=https://www.snapeda.com/parts/LTST-C19HE1WT/Lite-On/view-part/?ref=eda, MF="Lite-On Inc.", MP=LTST-C19HE1WT, SnapEDA_Link=https://www.snapeda.com/parts/LTST-C19HE1WT/Lite-On/view-part/?ref=snap
LED1 LED2: library part 1206_LED
U3: "Description", Manufacturer_Name=Attend, Copyright="Copyright (C) 2025 Ultra Librarian. All rights reserved.", Manufacturer_Part_Number=112J-TDAR-R01, RefDes=RefDes, Type=Type
ZD1: library part SMD_Zener_Diyot

## Via types
v1: diameter 0.61, hole 0.305, SIG/GND to SIG/POW, tented both sides, 174 vias
v2: diameter 1.27, hole 0.711, SIG/GND to SIG/POW, tented both sides, 1 vias

## Nets (pads, with @x,y where several pads share a name; then routed paths per layer and width w, separated by ;. In a path a pad name is that pad's centre, name@x,y a point inside that pad or via, vN(x,y) a via of type N, cw(c..) or ccw(c..) an arc to the next point about the centre after c; other vN are vias at no path point)
+3.3V: C1.2 C2.2 C3.2 C4.2 C5.2 C6.2 C7.2 C8.2 C9.2 C19.2 C20.2 C23.2 C24.2 C25.2 C26.2 C27.2 CN1.1 CN2.2 CN6.1 CN7.1 D1.4 LED1.1 P1.1 P2.1 R1.1 R3.2 R4.2 R5.2 R6.2 R7.2 R8.2 R9.2 R10.2 R11.2 R23.2 R24.2 R25.2 R26.2 R27.2 U1.6 U1.11 U1.22 U1.28 U1.50 U1.73 U1.75 U1.100 U2.3 U3.4 U4.2 U4.3 U5.4 | length 63.5
  SIG/GND w0.203: v1(21.717,76.2) 21.827,76.2 22.118,76.491 D1.4 ; P1.1 22.098,37.973 v1(22.352,37.719) ; LED1.1 22.86,85.09 v1(23.622,84.328) ; v1(24.638,37.719) 24.892,37.973 P2.1 ; v1(28.067,33.401) 28.067,33.511 28.269,33.713 U3.4 ; U4.3 U4.2 ; v1(38.608,54.356) R3.2 ; v1(38.862,59.817) R11.2 ; v1(38.989,51.689) 39.243,51.435 R4.2 ; v1(38.989,58.039) 39.741,58.039 R10.2 ; CN1.1 40.513,47.97 41.013,48.47 41.319,48.47 41.57,48.721 C8.2 ; C19.2 43.984,72.161 44.213,72.39 v1(44.323,72.39) ; v1@43.942,48.26 43.964,48.282 U1.100 ; v1(44.069,62.23) 44.179,62.23 44.487,62.538 U1.75 45.763,62.586 45.763,63.381 46.008,63.627 46.42,63.627 46.666,63.381 46.666,62.586 U1.73 ; C9.2 C7.2 C6.2 47.33,64.856 v1(47.625,65.151) ; v1(47.625,43.721) 47.625,44.364 C1.2 C2.2 ; C20.2 48.785,72.136 49.039,71.882 v1(49.149,71.882) ; U1.6 48.214,48.358 48.412,48.556 v1(48.412,48.666) ; v1(50.038,38.989) 50.038,38.889 50.419,38.508 C27.2 ; U1.11 50.763,47.086 50.763,47.881 51.395,48.514 v1(51.943,48.514) ; v1(52.705,24.892) 53.467,24.892 56.632,28.057 R1.1@56.632,29.369 ; C3.2 55.667,43.52 v1(55.753,43.434) ; v1(56.007,48.895) 56.007,48.785 56.214,48.578 U1.22 ; U1.28 61.677,49.788 C4.2 ; U1.50 60.064,60.788 v1(60.579,61.302) 61.466,61.302 C5.2 ; U5.4 63.898,40.586 63.898,39.734 64.389,39.243 v1(65.278,39.243) ; CN6.1 86.427,23.499 87.808,22.118 88.499,22.118 v1(88.519,22.098)
  SIG/POW w0.203: v1(23.749,28.575) 23.876,28.702 R25.2 ; v1(25.527,32.131) 25.59,32.131 25.908,31.813 C24.2 ; C23.2 27.94,31.813 28.194,32.067 v1(28.194,32.131) ; v1(29.464,28.321) R24.2 ; R23.2 31.242,28.802 31.623,28.421 v1(31.623,28.321)
  other v1: 43.948,48.336 76.835,48.387 78.232,48.387 60.96,49.784 33.094,52.59 28.829,53.086 28.829,54.102 39.37,76.2 37.719,77.724 39.37,77.724 37.719,79.248 39.37,79.248
+5V: BZ1.1 C21.2 C22.2 C28.2 C29.2 C30.2 CARD1.6 CARD2.7 CARD2.8 CN3.1 CN4.1 CN5.1 CN8.1 CN10.1 CN11.1 CN12.1 CN13.1 CN15.1 IC1.5 P5.1 P6.1 U2.1 U5.20 | length 11.6
  SIG/GND w0.203: v1(42.037,33.528) 42.431,33.134 CN15.1 ; v1(42.164,35.687) 42.504,36.027 C28.2 ; v1(45.212,37.465) 45.212,37.973 45.593,38.354 46.752,38.354 46.871,38.235 IC1.5 ; v1(60.452,31.877) 60.602,32.027 U5.20 ; C30.2 63.078,29.804 v1(63.246,29.972) ; C29.2 63.078,31.582 v1(63.246,31.75)
  SIG/GND w0.381: CARD1.6 v1(66.04,70.485)
  other v1: 23.495,42.037 38.887,81.229 40.615,81.305 42.393,81.305 38.862,82.855 40.564,83.007 38.786,84.709 40.589,84.709
+12V: C17.1 CARD2.3 CARD2.4 CN14.2 R12.1 | length 1.1
  SIG/POW w0.203: R12.1 81.798,73.942 82.075,74.219 82.103,74.219 82.306,74.422 v1(82.677,74.422)
AUX_LED: CARD1.5 LED2.1 | length 49.3
  SIG/GND w0.381: LED2.1 22.606,81.288 23.166,80.728 25.209,80.728 26.054,79.883 32.512,79.883 41.148,71.247 41.275,71.12 47.752,71.12 52.959,65.913 62.738,65.913 63.422,66.597 63.422,67.867 CARD1.5
BOOT0: R2.1 U1.94 | length 2.9
  SIG/GND w0.203: R2.1 41.539,52.931 41.816,52.654 41.844,52.654 42.71,51.788 U1.94
GND: BT1.2 BT1.3 C1.1 C2.1 C3.1 C4.1 C5.1 C6.1 C7.1 C8.1 C9.1 C10.1 C11.1 C12.1 C13.1 C14.1 C15.2 C16.2 C17.2 C18.1 C19.1 C20.1 C21.1 C22.1 C23.1 C24.1 C25.1 C26.1 C27.1 C28.1 C29.1 C30.1 C31.1 CARD1.7 CARD2.1 CARD2.2 CARD2.5 CARD2.6 CN1.3 CN2.5 CN3.5 CN4.5 CN5.4 CN6.6 CN7.3 CN8.6 CN9.6 CN10.4 CN11.4 CN12.4 CN13.6 CN14.1 CN15.4 CN15.5 CR1.2 CR1.4 IC1.2 P10.1 P11.1 P12.1 P13.1 R14.1 R16.1 R17.1 R21.2 R22.1 U1.10 U1.19 U1.27 U1.49 U1.74 U1.99 U2.2 U3.6 U3.9 U3.10 U3.11 U3.12 U3.13 U3.14 U3.15 U4.7 U5.7 U5.18 U5.21 U5.25 ZD1.1 | length 81.7
  SIG/GND w0.203: U3.14 21.144,26.478 v1@21.336,26.67 ; U3.12 21.569,33.422 v1(21.717,33.274) ; U3.9 22.769,34.127 v1@22.86,34.036 ; v1(26.035,33.909) 26.035,35.358 U3.6 ; P11.1 P10.1 ; P13.1 P12.1 ; v1(28.575,51.816) 28.685,51.816 28.98,51.521 C26.1 ; v1(28.575,55.372) 28.685,55.372 28.98,55.667 C25.1 ; v1(30.861,83.82) 30.861,82.56 R17.1 ; v1@30.861,88.265 30.871,88.255 R16.1 ; v1@33.909,55.753 34.131,55.753 34.544,55.34 U4.7 ; v1@35.433,34.417 v1(35.459,34.443) 35.646,34.63 U3.13 ; v1@36.576,27.051 37.157,26.47 U3.15 ; v1@38.989,48.895 39.116,48.768 C8.1 ; v1@38.989,49.784 v1(39.015,49.81) 39.243,50.038 C10.1 ; v1@39.878,86.995 v1(39.904,87.021) 40.005,87.122 C22.1 ; v1(40.894,73.025) 40.894,72.955 41.389,72.46 41.389,72.413 C19.1 ; v1(42.164,47.752) 42.202,47.79 42.202,48.953 42.537,49.288 U1.99 ; C28.1 43.688,37.76 v1(43.688,38.735) ; C9.1 44.196,67.183 v1(44.323,67.31) ; C7.1 45.466,67.183 v1(45.593,67.31) ; v1@45.466,72.136 C20.1 ; v1(45.974,60.706) 46.214,60.946 U1.74 ; C21.1 46.091,86.995 v1(46.99,86.995) ; C6.1 46.736,67.003 46.99,67.257 v1(46.99,67.31) ; v1@46.863,36.703 46.871,36.695 IC1.2 ; v1(47.498,41.656) 47.752,41.91 C1.1 ; C2.1 49.022,42.01 49.403,41.629 v1(49.403,41.529) ; v1(49.784,48.514) 49.784,48.416 50.166,48.034 50.166,47.086 U1.10 ; C27.1 51.095,36.027 v1(51.943,35.179) ; C3.1 53.381,45.085 v1(54.356,45.085) 54.356,45.195 54.714,45.553 U1.19 ; v1(58.166,59.817) 58.588,60.239 59.416,60.239 U1.49 ; U5.18 59.302,33.902 v1(59.436,34.036) ; U1.27 60.567,49.288 61.087,48.768 v1(61.341,48.768) ; U5.21 61.252,33.82 v1(61.341,33.909) ; C31.1 61.255,30.14 v1(61.468,30.353) ; U5.7 61.894,41.447 v1(62.357,41.91) ; v1(63.119,25.4) 63.325,25.606 BT1.2 ; C11.1 63.898,59.944 64.152,59.69 v1(64.262,59.69) ; C5.1 63.817,61.214 64.135,60.896 v1(64.135,60.833) ; v1(63.246,22.479) 63.373,22.606 BT1.3 ; v1(63.246,48.641) 63.246,49.789 C4.1@63.455,49.997 ; U5.25 63.852,33.88 v1(64.008,34.036) ; C12.1 65.405,27.686 v1(65.532,27.559) ; C30.1 65.405,29.21 v1(65.532,29.083) ; C29.1 65.405,30.988 v1(65.532,30.861)
  SIG/POW w0.203: v1(25.781,28.702) 25.908,28.829 C24.1 ; C23.1 28.067,29.423 v1(28.067,28.575) ; v1@29.972,68.072 v1(29.998,68.098) 30.089,68.189 R21.2 ; R22.1 34.808,69.877 35.052,70.121 v1(35.052,70.231) ; v1(44.577,39.751) 44.577,39.861 44.831,40.115 C15.2 ; v1(46.101,39.751) 46.101,39.861 46.355,40.115 C16.2 ; v1@48.26,41.656 v1(48.286,41.682) 48.387,41.783 C13.1 ; CR1.4 50.613,44.465 51.435,43.643 v1(51.435,43.561) ; CR1.2 52.813,41.711 53.086,41.438 v1(53.086,41.402) ; v1(54.61,41.529) 54.864,41.783 C14.1 ; ZD1.1 74.168,77.47 v1(74.422,77.724) ; R14.1 82.55,77.851 v1(82.804,78.105) ; C18.1 82.55,76.073 v1(82.804,76.327)
  other v1: 21.362,26.696 36.602,27.077 22.886,34.062 46.889,36.729 28.538,38.888 28.538,42.063 39.015,48.921 33.935,55.779 45.492,72.162 49.175,82.83 49.175,85.116 30.897,88.281
NetBZ1_2: BZ1.2 TR1.3 | length 4.6
  SIG/POW w0.254: TR1.3 34.534,64.643 BZ1.2
NetC31_2: C31.2 U5.17 | length 4.1
  SIG/GND w0.381: U5.17 58.652,31.645 59.649,30.648 C31.2
NetCN1_2: CN1.2 R2.2 | length 8.3
  SIG/GND w0.203: CN1.2 37.973,52.324 38.608,52.959 R2.2
NetD1_1: D1.1 R18.2 | length 3.9
  SIG/GND w0.254: D1.1 22.978,77.976 22.978,78.591 23.127,78.74 R18.2
NetD1_2: D1.2 R19.2 | length 2.7
  SIG/GND w0.254: D1.2@23.851,77.927 23.825,77.857 24.021,77.661 24.101,77.661 24.547,77.216 R19.2
NetD1_3: D1.3 R20.2 | length 2.7
  SIG/GND w0.254: D1.3 23.825,76.409 24.021,76.214 24.101,76.214 24.623,75.692 R20.2
NetLED1_2: LED1.2 R16.2 | length 2.6
  SIG/GND w0.254: LED1.2 27.432,87.122 R16.2
NetLED2_2: LED2.2 R17.2 | length 3.1
  SIG/GND w0.254: LED2.2 26.67,81.927 27.293,82.55 R17.2
NetR13_2: R13.2 R21.1 TR1.1 | length 3.4
  SIG/POW w0.254: TR1.1 31.628,67.188 31.628,69.083 R21.1 R13.2
NetR22_2: R22.2 TR1.2 | length 2.1
  SIG/POW w0.254: R22.2 33.264,68.191 33.541,67.914 33.541,67.297 TR1.2
NRST: BT1.1 BT1.4 C12.2 CN2.1 R1.2 U1.14 | length 91.7
  SIG/GND w0.203: U1.14 52.214,40.513 52.214,37.107 58.176,31.146 R1.2@58.176,29.369
  SIG/GND w0.381: v1(41.91,40.513) 52.214,40.513 ; BT1.4 BT1.1 57.15,28.315 R1.2@58.176,29.341 ; R1.2@58.176,29.369 R1.2@58.176,29.341 ; C12.2 59.83,27.686 R1.2@58.176,29.341
  SIG/POW w0.381: CN2.1 23.106,66.294 25.908,63.492 25.908,54.61 22.098,50.8 22.098,41.148 22.733,40.513 v1(41.91,40.513)
PA0_UART4_TX: CN12.2 U1.23 | length 32.1
  SIG/GND w0.203: U1.23 56.763,46.989 56.763,46.155 58.722,44.196 v1(60.198,44.196)
  SIG/POW w0.203: v1(60.198,44.196) 67.214,44.196 77.501,33.909 79.922,33.909 81.831,32 CN12.2
PA1_UART4_RX: CN12.3 U1.24 | length 30.7
  SIG/GND w0.203: U1.24 57.263,46.989 57.263,46.194 57.991,45.466 60.071,45.466 62.23,43.307 v1(62.23,42.799)
  SIG/POW w0.203: v1(62.23,42.799) 67.564,42.799 76.962,33.401 79.502,33.401 80.331,32.572 CN12.3
PA2_USART2_TX: CARD1.3 U1.25 | length 99.1
  SIG/GND w0.203: U1.25 57.714,46.438 57.763,46.389 58.513,46.389 v1(58.547,46.355) ; CARD1.3 58.42,70.612 59.817,72.009 85.471,72.009 v1(86.741,73.279)
  SIG/POW w0.203: v1(58.547,46.355) 66.675,46.355 72.898,40.132 76.581,40.132 77.597,41.148 87.884,41.148 88.646,41.91 88.646,71.374 v1(86.741,73.279)
PA3_USART2_RX: CARD1.4 U1.26 | length 90.3
  SIG/GND w0.203: U1.26 60.064,48.788 60.113,48.739 60.113,48.726 60.833,48.006 66.929,48.006 73.533,41.402 v1(74.422,41.402) ; CARD1.4 60.96,70.612 61.976,71.628 v1(86.995,71.628)
  SIG/POW w0.203: v1(74.422,41.402) 76.073,41.402 76.327,41.656 86.995,41.656 87.63,42.291 87.63,70.993 v1(86.995,71.628)
PA4_ADC2_INP18: P9.1 U1.29 | length 44.3
  SIG/GND w0.203: P9.1 v1(23.495,45.466) ; v1(57.912,49.911) 58.021,49.911 58.397,50.288 U1.29
  SIG/POW w0.203: v1(23.495,45.466) 23.495,43.934 23.614,43.815 41.656,43.815 43.339,45.498 43.339,49.181 44.704,50.546 55.372,50.546 56.007,49.911 v1(57.912,49.911)
PA5_SPI1_SCK: CN13.4 U1.30 | length 27.1
  SIG/GND w0.203: U1.30 66.702,50.788 74.818,42.672 81.661,42.672 81.915,42.926 CN13.4
PA7_ADC2_INP7: P14.1 U1.32 | length 38
  SIG/GND w0.203: P14.1 27.813,45.593 v1(29.21,45.593) ; v1(57.785,51.054) 57.863,51.132 57.863,51.513 58.138,51.788 U1.32
  SIG/POW w0.203: v1(29.21,45.593) 30.607,44.196 41.498,44.196 42.799,45.497 42.799,49.276 44.577,51.054 v1(57.785,51.054)
PA10_USART1_RX: CN11.3 U1.69 | length 36.3
  SIG/GND w0.203: U1.69 48.736,62.516 48.736,61.373 v1(49.784,60.325)
  SIG/POW w0.203: v1(49.784,60.325) 50.14,60.681 59.284,60.681 59.817,61.214 59.817,62.865 60.071,63.119 80.212,63.119 80.331,63.238 CN11.3
PA13_SWDIO: CN2.3 U1.72 | length 28.4
  SIG/GND w0.203: CN2.3 23.106,61.214 24.503,59.817 36.576,59.817 40.767,64.008 47.125,64.008 47.244,63.889 47.244,62.567 U1.72
PA14_SWCLK: CN2.4 U1.76 | length 22.2
  SIG/GND w0.203: CN2.4 36.449,58.674 38.563,60.788 U1.76
PB3_TIM2_CH2: P8.1 U1.89 | length 28
  SIG/GND w0.203: P8.1 v1(26.289,49.022) ; U1.89 44.013,54.336 45.065,54.336 v1(45.593,54.864)
  SIG/POW w0.203: v1(26.289,49.022) 26.289,48.125 26.408,48.006 39.878,48.006 41.116,49.244 41.116,52.038 43.414,54.336 45.065,54.336 v1(45.593,54.864)
PB4_SPI1_MISO: CN13.2 U1.90 | length 47
  SIG/GND w0.203: U1.90 50.86,53.788 v1(52.451,52.197)
  SIG/POW w0.203: v1(52.451,52.197) 53.213,51.435 55.626,51.435 55.88,51.689 61.087,51.689 61.722,51.054 65.024,51.054 73.787,42.291 83.693,42.291 84.82,43.418 84.82,43.974 CN13.2
PB5_USART6_TX: CN8.3 U1.91 | length 50.7
  SIG/GND w0.203: U1.91 48.947,53.288 v1(53.594,48.641)
  SIG/POW w0.203: v1(53.594,48.641) 72.866,29.369 83.026,29.369 83.415,28.98 CN8.3
PB6_USART6_RX: CN8.2 U1.92 | length 52.3
  SIG/GND w0.203: U1.92 48.431,52.788 v1(51.435,49.784)
  SIG/POW w0.203: v1(51.435,49.784) 53.594,49.784 73.533,29.845 84.455,29.845 84.963,29.337 84.963,27.861 CN8.2
PB7_I2C1_SDA: CN5.3 CN8.5 R3.1 R27.1 U1.93 U4.6 | length 86.1
  SIG/GND w0.203: R27.1 31.242,56.396 31.361,56.515 35.56,56.515 35.994,56.081 U4.6 36.192,55.038 36.758,55.038 36.761,55.042 41.177,55.042 41.296,54.923 41.296,54.598 R3.1 41.539,54.328 42.291,53.576 42.291,52.959 42.962,52.288 U1.93 47.788,52.288 50.001,50.075 50.001,50.058 50.165,49.894 v1(50.165,49.784)
  SIG/POW w0.203: v1(50.165,49.784) 50.165,49.149 51.562,47.752 53.594,47.752 75.184,26.162 79.883,26.162 80.415,26.694 CN8.5 ; CN5.3 80.331,35.564 82.748,33.147 83.439,33.147 87.757,28.829 87.757,26.924 86.995,26.162 81.026,26.162 80.415,26.773
PB8_I2C1_SCL: CN5.2 CN8.4 R4.1 R26.1 U1.95 U4.5 | length 90.2
  SIG/GND w0.203: R26.1 31.242,50.673 31.458,50.457 34.074,50.457 34.417,50.8 34.417,53.086 34.671,53.34 U4.5 38.413,53.34 38.718,53.645 40.489,53.645 40.767,53.367 40.767,51.819 40.886,51.7 41.274,51.7 R4.1 42.164,51.435 42.311,51.288 U1.95 48.026,51.288 48.895,50.419 v1(48.895,49.784) ; v1(76.2,25.4) 81.026,25.4 81.915,26.289 ; CN5.2 81.831,34.755 82.804,33.782 83.693,33.782 88.519,28.956 88.519,26.67 87.249,25.4 82.804,25.4 81.915,26.289 ; CN8.4 81.915,26.289
  SIG/POW w0.203: v1(48.895,49.784) 48.895,49.741 49.174,49.462 49.174,47.6 49.784,46.99 53.594,46.99 75.184,25.4 v1(76.2,25.4)
PB10_USART3_TX: CN10.2 U1.47 | length 23.7
  SIG/GND w0.203: U1.47 60.469,59.288 60.956,58.801 81.534,58.801 81.831,59.098 CN10.2
PB12_UART5_RX: U1.51 U5.1 | length 26.1
  SIG/GND w0.203: U1.51 57.714,61.428 57.023,60.737 57.023,49.784 64.376,42.431 64.884,42.431 65.802,41.513 U5.1
PB13_UART5_TX: U1.52 U5.5 | length 25
  SIG/GND w0.203: U1.52 57.214,61.467 56.515,60.768 56.515,49.657 63.194,42.978 U5.5
PB14_USART1_TX: CN11.2 U1.53 | length 28
  SIG/GND w0.203: U1.53 56.731,62.555 56.731,63.446 57.04,63.754 59.817,63.754 v1(61.087,62.484)
  SIG/POW w0.203: v1(61.087,62.484) 81.28,62.484 81.831,63.035 CN11.2
PB15_SPI1_MOSI: CN13.3 U1.54 | length 45.4
  SIG/GND w0.203: v1@54.102,52.197 v1(54.165,52.197) 54.229,52.197 55.753,53.721 55.753,61.087 56.214,61.548 U1.54
  SIG/POW w0.203: v1(54.165,52.197) 65.024,52.197 74.295,42.926 83.185,42.926 83.415,43.156 CN13.3
PC4_ADC1_INP4: CN7.2 U1.33 | length 44.1
  SIG/GND w0.203: U1.33 68.476,52.288 74.917,45.847 87.503,45.847 88.265,45.085 88.265,41.91 87.503,41.148 81.407,41.148 81.141,40.882 CN7.2
PC5_ADC1_INP8: C18.2 R12.2 R14.2 U1.34 ZD1.2 | length 59.1
  SIG/GND w0.203: v1(58.928,62.103) 57.531,60.706 57.531,53.34 58.083,52.788 U1.34
  SIG/POW w0.203: v1(58.928,62.103) 58.928,62.738 59.817,63.627 74.168,63.627 76.2,65.659 85.09,65.659 86.276,66.845 86.276,70.569 84.328,72.517 81.623,72.517 80.239,73.901 R12.2@80.239,73.929
  SIG/POW w0.381: ZD1.2@77.724,76.708 78.359,76.073 C18.2 ; R14.2 80.175,77.803 80.175,76.121 C18.2 ; R12.2@80.239,73.929 80.239,76.058 C18.2
PC7_TIM3_CH2: CN4.2 U1.64 | length 38
  SIG/GND w0.203: v1(50.8,64.897) 50.8,64.079 51.214,63.665 U1.64
  SIG/POW w0.203: v1(50.8,64.897) 61.176,64.897 62.031,64.042 72.678,64.042 74.676,66.04 82.423,66.04 83.451,67.068 CN4.2
PC8_TIM3_CH3: CN4.3 U1.65 | length 37.5
  SIG/GND w0.203: v1(49.911,65.532) 49.911,64.389 50.644,63.656 50.644,63.305 50.666,63.283 50.666,62.586 U1.65
  SIG/POW w0.203: v1(49.911,65.532) 51.943,65.532 52.197,65.278 72.263,65.278 73.406,66.421 81.28,66.421 81.951,67.092 CN4.3
PC9_TIM3_CH4: CN4.4 U1.66 | length 38
  SIG/GND w0.203: v1(48.768,66.421) 48.768,64.779 50.166,63.381 50.166,62.586 U1.66
  SIG/POW w0.203: v1(48.768,66.421) 51.943,66.421 52.451,65.913 71.374,65.913 72.281,66.82 80.028,66.82 80.451,67.243 CN4.4
PC10_GPIO: P7.1 R11.1 U1.78 | length 28.2
  SIG/GND w0.203: P7.1 22.098,51.943 27.88,57.725 37.405,57.725 38.659,58.979 40.337,58.979 40.672,59.315 40.672,59.634 40.856,59.817 R11.1 41.568,59.788 U1.78
PC11_GPIO: P3.1 R10.1 U1.79 | length 24.7
  SIG/GND w0.203: P3.1 27.686,56.134 28.702,57.15 40.424,57.15 41.539,58.265 R10.1 41.605,58.359 42.103,58.359 42.983,59.239 43.916,59.239 U1.79
PC12_GPIO: CN13.5 U1.80 | length 44.9
  SIG/GND w0.203: U1.80 44.013,58.836 44.993,58.836 46.101,59.944 48.514,59.944 v1(50.292,58.166) ; v1(69.215,55.626) 74.803,50.038 v1(74.803,48.514)
  SIG/POW w0.203: v1(50.292,58.166) 50.36,58.166 50.614,57.912 66.929,57.912 v1(69.215,55.626) ; v1(74.803,48.514) 76.454,46.863 78.486,46.863 80.415,44.934 CN13.5
PC14: C15.1 CR2.1 U1.8 | length 8.2
  SIG/GND w0.203: v1(44.958,45.593) 45.068,45.593 45.407,45.933 48.904,45.933 49.166,46.194 49.166,46.989 U1.8
  SIG/POW w0.203: C15.1 44.831,44.069 CR2.1 44.704,45.339 v1(44.958,45.593)
PC15: C16.1 CR2.2 U1.9 | length 7.4
  SIG/GND w0.203: v1(46.482,45.339) 49.547,45.339 49.666,45.458 49.666,46.989 U1.9
  SIG/POW w0.203: C16.1 46.355,44.069 CR2.2 v1(46.482,45.339)
PD1_GPIO: CN9.1 R5.1 U1.82 | length 49.8
  SIG/GND w0.203: U1.82 44.013,57.836 44.808,57.836 45.773,58.801 v1(47.625,58.801) ; R5.1@86.451,48.433 CN9.1@86.451,52.034
  SIG/GND w0.381: CN9.1 CN9.1@86.451,52.034 ; R5.1@86.451,48.433 R5.1
  SIG/POW w0.203: v1(47.625,58.801) 51.562,54.864 84.328,54.864 86.384,52.808 86.384,52.101 CN9.1
PD2_GPIO: CN9.2 R6.1 U1.83 | length 47.6
  SIG/GND w0.203: U1.83 45.199,57.288 45.57,57.658 v1(47.244,57.658) ; R6.1@84.939,48.421 CN9.2@84.939,52.046
  SIG/GND w0.381: CN9.2 CN9.2@84.939,52.046 ; R6.1@84.939,48.421 R6.1
  SIG/POW w0.203: v1(47.244,57.658) 50.546,54.356 83.439,54.356 84.915,52.88 CN9.2
PD3_GPIO: CN9.3 R7.1 U1.84 | length 45.5
  SIG/GND w0.203: U1.84 43.974,56.778 46.727,56.778 v1(46.736,56.769) ; R7.1@83.427,48.409 CN9.3@83.427,52.058
  SIG/GND w0.381: CN9.3 CN9.3@83.427,52.058 ; R7.1@83.427,48.409 R7.1
  SIG/POW w0.203: v1(46.736,56.769) 47.244,56.769 50.165,53.848 82.423,53.848 83.415,52.856 CN9.3
PD4_GPIO: CN9.4 R8.1 U1.85 | length 43.4
  SIG/GND w0.203: U1.85 46.074,56.288 46.445,55.917 46.826,55.917 v1(46.863,55.88) ; R8.1 CN9.4
  SIG/POW w0.203: v1(46.863,55.88) 47.371,55.88 49.784,53.467 80.518,53.467 CN9.4
PD5_GPIO: CN9.5 R9.1 U1.86 | length 41.7
  SIG/GND w0.203: U1.86 45.812,55.788 v1(46.609,54.991) ; R9.1@80.403,48.409 CN9.5@80.403,52.058
  SIG/GND w0.381: R9.1 R9.1@80.403,48.409 ; CN9.5@80.403,52.058 CN9.5
  SIG/POW w0.203: v1(46.609,54.991) 48.641,52.959 79.526,52.959 CN9.5
PD6_GPIO: CARD1.1 U1.87 | length 24.6
  SIG/GND w0.203: v1(42.418,56.261) 42.392,56.235 42.392,55.779 42.835,55.336 43.916,55.336 U1.87
  SIG/POW w0.203: v1(42.418,56.261) 42.418,67.437 42.926,67.945 CARD1.1
PD7_GPIO: CARD1.2 U1.88 | length 30.9
  SIG/GND w0.203: v1(42.418,54.864) 42.456,54.826 43.926,54.826 U1.88
  SIG/POW w0.203: v1(42.418,54.864) 41.656,55.626 41.656,68.326 42.842,69.512 54.694,69.512 55.88,68.326 CARD1.2
PD9_USART3_RX: CN10.3 U1.56 | length 28.9
  SIG/GND w0.203: U1.56 55.263,62.586 55.263,63.283 55.285,63.305 55.285,63.404 56.143,64.262 61.214,64.262 63.373,62.103 79.756,62.103 80.331,61.528 CN10.3
PD12_TIM4_CH1: R18.1 U1.59 | length 33.8
  SIG/GND w0.203: R18.1 32.639,78.74 40.894,70.485 47.625,70.485 53.714,64.396 U1.59
PD13_TIM4_CH2: R19.1 U1.60 | length 32.6
  SIG/GND w0.203: R19.1 33.274,77.216 40.64,69.85 47.625,69.85 53.214,64.261 U1.60
PD14_TIM4_CH3: R20.1 U1.61 | length 31.4
  SIG/GND w0.203: R20.1 33.909,75.692 40.259,69.342 47.498,69.342 52.714,64.126 U1.61
PD15_TIM4_CH4: P4.1 U1.62 | length 51.4
  SIG/GND w0.203: P4.1 v1(26.289,45.466) ; v1(40.767,68.326) 41.021,68.326 v1(43.053,66.294) ; v1(51.816,64.135) 52.214,63.737 U1.62
  SIG/POW w0.203: v1(26.289,45.466) 26.289,46.228 25.019,47.498 25.019,52.07 27.432,54.483 27.432,60.198 28.321,61.087 37.846,61.087 39.497,62.738 39.497,67.056 v1(40.767,68.326) ; v1(43.053,66.294) 45.212,64.135 v1(51.816,64.135)
PE2_SPI4_SCK: CN6.4 U1.1 U3.5 | length 93.9
  SIG/GND w0.203: U1.1 45.02,47.038 43.852,45.87 43.852,44.689 36.11,36.948 27.677,36.948 27.169,36.44 U3.5 27.169,26.552 28.321,25.4 28.321,22.852 30.091,21.082 80.645,21.082 81.927,22.364 CN6.4
PE4_GPIO: CN6.5 R23.1 U1.3 U3.2 | length 96.3
  SIG/GND w0.203: U3.2 30.48,35.381 v1(30.48,33.02) 30.48,23.241 32.131,21.59 79.629,21.59 80.427,22.388 CN6.5 ; v1(46.609,48.768) 46.714,48.663 U1.3
  SIG/POW w0.203: R23.1 31.214,31.125 30.937,31.402 30.937,31.43 30.48,31.887 v1(30.48,33.02) 30.48,35.56 33.655,38.735 41.91,38.735 43.322,40.147 43.322,44.943 44.14,45.76 44.14,47.188 45.72,48.768 v1(46.609,48.768)
PE5_SPI4_MISO: CN6.2 R25.1 U1.4 U3.7 | length 112.5
  SIG/GND w0.203: v1(24.892,33.401) 24.892,35.315 U3.7 24.969,36.78 25.781,37.592 31.4,37.592 33.686,39.878 37.084,39.878 45.72,48.514 45.72,49.149 46.228,49.657 47.095,49.657 47.214,49.538 U1.4
  SIG/POW w0.203: v1(24.892,33.401) 24.892,32.893 23.876,31.877 R25.1 22.87,31.125 22.352,30.607 22.352,21.717 23.241,20.828 83.947,20.828 84.927,21.808 CN6.2
PE6_SPI4_MOSI: CN6.3 R24.1 U1.5 U3.3 | length 101.5
  SIG/GND w0.203: v1(29.337,33.02) 29.337,35.36 U3.3 ; v1(31.369,38.862) 32.131,38.862 33.655,40.386 36.957,40.386 45.039,48.468 45.039,49.103 45.974,50.038 47.404,50.038 47.666,49.776 47.666,47.086 U1.5
  SIG/POW w0.203: R24.1@29.337,31.125 v1(29.337,33.02) ; v1(31.369,38.862) 31.369,38.1 29.337,36.068 v1(29.337,33.02) ; CN6.3 83.418,23.74 83.418,21.95 82.804,21.336 31.877,21.336 30.353,22.86 30.353,30.236 R24.1 29.464,32.893 v1(29.337,33.02)
PE9_TIM1_CH1: R13.1 U1.40 | length 37.5
  SIG/GND w0.203: v2(30.861,72.136) 35.687,72.136 v1(43.18,64.643) ; v1(58.166,56.007) 58.385,55.788 U1.40
  SIG/POW w0.203: R13.1 30.103,70.626 30.103,71.378 v2(30.861,72.136) ; v1(43.18,64.643) 48.753,59.07 48.753,58.562 51.308,56.007 v1(58.166,56.007)
PE11_TIM1_CH2: CN3.2 U1.42 | length 27.1
  SIG/GND w0.203: U1.42 73.185,56.788 73.203,56.769 v1(74.676,56.769)
  SIG/POW w0.203: v1(74.676,56.769) 74.676,57.912 75.311,58.547 82.296,58.547 83.451,57.392 CN3.2
PE13_TIM1_CH3: CN3.3 U1.44 | length 23.5
  SIG/GND w0.203: U1.44 75.624,57.788 76.135,57.277 v1(76.2,57.277)
  SIG/POW w0.203: v1(76.2,57.277) 81.407,57.277 81.866,56.818 81.866,56.219 CN3.3
PE14_TIM1_CH4: CN3.4 U1.45 | length 21.9
  SIG/GND w0.203: U1.45 59.513,58.239 78.346,58.239 CN3.4
PH0: C13.2 CR1.1 U1.12 | length 7.3
  SIG/GND w0.203: v1(50.8,45.498) 50.8,45.608 51.175,45.983 51.175,46.998 U1.12
  SIG/POW w0.203: C13.2 48.428,44.45 49.403,44.45 ; CR1.1 50.413,42.565 49.403,43.575 49.403,44.45 ; v1(50.8,45.498) 49.95,45.498 49.403,44.951 49.403,44.45
PH1: C14.2 CR1.3 U1.13 | length 5.6
  SIG/GND w0.203: v1(51.63,45.593) 51.672,45.635 51.672,46.996 U1.13
  SIG/POW w0.203: v1(51.63,45.593) 51.63,45.548 52.713,44.465 CR1.3 53.042,44.237 C14.2@55.118,44.237
USB'_N: IC1.1 U5.16 | length 15
  SIG/GND w0.203: IC1.1 46.415,35.897 v1@46.415,35.411 ; v1(57.637,35.158) 57.715,35.081 57.715,34.659 57.906,34.469 57.906,33.572 57.914,33.564 57.914,33.143 U5.16
  SIG/POW w0.203: v1(46.522,35.195) 46.522,35.305 46.599,35.382 46.599,35.516 47.422,36.338 56.224,36.338 57.326,35.236 57.56,35.236 v1(57.637,35.158)
USB'_P: IC1.3 U5.15 | length 13.5
  SIG/GND w0.203: v1(47.309,35.178) 47.309,35.609 47.323,35.622 47.323,35.893 IC1.3 ; v1(57.081,34.602) 57.126,34.602 57.449,34.279 57.449,33.572 57.441,33.564 57.441,33.143 U5.15
  SIG/POW w0.203: v1(47.309,35.178) 47.309,35.288 47.611,35.59 47.611,35.881 56.035,35.881 57.003,34.913 57.003,34.679 v1(57.081,34.602)
USB_N: CN15.2 IC1.6 | length 5
  SIG/GND w0.203: CN15.2 45.466,33.624 45.466,36.449 46.353,37.336 46.353,37.552 IC1.6
USB_P: CN15.3 IC1.4 | length 5
  SIG/GND w0.203: IC1.4 47.389,37.552 47.389,37.193 48.387,36.195 48.387,34.667 48.366,34.645 48.366,33.544 CN15.3
VCAP1: C11.2 U1.48 | length 2.2
  SIG/GND w0.203: U1.48 61.398,59.788 C11.2
VCAP2: C10.2 U1.98 | length 2.5
  SIG/GND w0.203: C10.2 42.468,50.038 42.718,49.788 U1.98
pads on no net: U1.2 U1.7 U1.15 U1.16 U1.17 U1.18 U1.20 U1.21 U1.31 U1.35 U1.36 U1.37 U1.38 U1.39 U1.41 U1.43 U1.46 U1.55 U1.57 U1.58 U1.63 U1.67 U1.68 U1.70 U1.71 U1.77 U1.81 U1.96 U1.97 U3.1 U3.8 U4.1 U4.4 U5.2 U5.3 U5.6 U5.8 U5.9 U5.10 U5.11 U5.12 U5.13 U5.14 U5.19 U5.22 U5.23 U5.24 U5.26 U5.27 U5.28 V1.1 V2.1

## Polygon pours and split planes (outlines as drawn)
+3.3V on POWER (split plane): 89.49,68.745 89.472,68.771 86.475,71.768 86.445,71.788 86.411,71.795 69.176,71.795 61.913,79.058 61.884,79.078 61.849,79.085 50.457,79.085 45.684,83.858 45.684,88.138 45.677,88.173 45.657,88.202 45.149,88.71 45.12,88.73 45.085,88.737 42.291,88.737 42.256,88.73 42.227,88.71 41.491,87.975 38.862,87.975 38.827,87.968 38.798,87.948 37.909,87.059 37.889,87.03 37.882,86.995 37.882,80.518 37.889,80.483 37.909,80.454 38.036,80.327 38.065,80.307 38.1,80.3 42.38,80.3 45.402,77.279 45.431,77.259 45.466,77.252 45.936,77.252 53.53,69.659 53.559,69.639 53.594,69.632 83.655,69.632 84.11,69.177 84.11,66.84 82.486,65.215 82.466,65.186 82.459,65.151 82.459,58.928 82.466,58.893 82.486,58.864 84.11,57.239 84.11,54.356 84.117,54.321 84.137,54.292 85.026,53.403 85.055,53.383 85.09,53.376 86.576,53.376 87.285,52.667 87.285,50.711 85.534,48.959 85.514,48.93 85.507,48.895 85.507,41.948 84.772,41.212 84.752,41.183 84.745,41.148 84.745,38.9 82.486,36.64 82.466,36.611 82.459,36.576 82.459,30.48 82.466,30.445 82.486,30.416 83.629,29.273 83.658,29.253 83.693,29.246 84.671,29.246 85.507,28.41 85.507,27.089 85.052,26.634 70.142,26.634 66.766,30.01 66.766,31.623 66.759,31.658 66.739,31.687 65.342,33.084 65.313,33.104 65.278,33.111 63.538,33.111 61.024,35.624 60.995,35.644 60.96,35.651 54.14,35.651 51.499,38.291 51.47,38.311 51.435,38.318 39.916,38.318 27.777,50.457 27.777,56.35 31.687,60.261 31.707,60.29 31.714,60.325 31.714,69.85 31.707,69.885 31.687,69.914 31.306,70.295 31.277,70.315 31.242,70.322 27.686,70.322 27.651,70.315 27.622,70.295 25.844,68.517 24.701,67.374 24.681,67.345 24.674,67.31 24.674,48.552 21.907,45.784 21.887,45.755 21.88,45.72 21.88,40.767 21.887,40.732 21.907,40.703 22.796,39.814 22.825,39.794 22.86,39.787 24.981,39.787 32.448,32.321 32.477,32.301 32.512,32.294 46.825,32.294 57.848,21.272 57.877,21.252 57.912,21.245 85.979,21.245 86.014,21.252 86.043,21.272 89.472,24.701 89.49,24.727 89.49,20.51 20.51,20.51 20.51,89.49 89.49,89.49
+5V on POWER (split plane): 45.502,88.1 45.502,83.82 45.509,83.785 45.529,83.756 50.355,78.93 50.384,78.91 50.419,78.903 61.811,78.903 69.075,71.64 69.104,71.62 69.139,71.614 86.373,71.614 89.317,68.669 89.317,24.803 85.941,21.427 57.95,21.427 46.927,32.449 46.898,32.469 46.863,32.476 32.55,32.476 25.083,39.942 25.054,39.962 25.019,39.969 22.898,39.969 22.062,40.805 22.062,45.682 24.829,48.45 24.849,48.479 24.856,48.514 24.856,67.272 25.972,68.389 27.724,70.14 31.204,70.14 31.532,69.812 31.532,60.363 27.622,56.452 27.602,56.423 27.595,56.388 27.595,50.419 27.602,50.384 27.622,50.355 39.814,38.163 39.843,38.143 39.878,38.136 51.397,38.136 54.038,35.496 54.067,35.476 54.102,35.469 60.922,35.469 63.436,32.956 63.465,32.936 63.5,32.929 65.24,32.929 66.584,31.585 66.584,29.972 66.591,29.937 66.611,29.908 70.04,26.479 70.069,26.459 70.104,26.452 85.09,26.452 85.125,26.459 85.154,26.479 85.662,26.987 85.682,27.016 85.689,27.051 85.689,28.448 85.682,28.483 85.662,28.512 84.773,29.401 84.744,29.421 84.709,29.428 83.731,29.428 82.641,30.518 82.641,36.538 84.9,38.798 84.92,38.827 84.927,38.862 84.927,41.11 85.662,41.846 85.682,41.875 85.689,41.91 85.689,48.857 87.44,50.609 87.46,50.638 87.467,50.673 87.467,52.705 87.46,52.74 87.44,52.769 86.678,53.531 86.649,53.551 86.614,53.558 85.128,53.558 84.292,54.394 84.292,57.277 84.285,57.312 84.265,57.341 82.641,58.966 82.641,65.113 84.265,66.738 84.285,66.767 84.292,66.802 84.292,69.215 84.285,69.25 84.265,69.279 83.757,69.787 83.728,69.807 83.693,69.814 53.632,69.814 46.038,77.407 46.009,77.427 45.974,77.434 45.504,77.434 42.482,80.455 42.453,80.475 42.418,80.482 38.138,80.482 38.064,80.556 38.064,86.957 38.9,87.793 41.529,87.793 41.564,87.8 41.593,87.82 42.329,88.555 45.047,88.555
+12V on POWER (split plane): 88.428,82.97 88.428,78.778 87.973,78.323 86.487,78.323 86.452,78.316 86.423,78.296 84.772,76.645 84.752,76.616 84.745,76.581 84.745,73.901 83.452,72.608 69.938,72.608 68.544,74.002 68.544,81.496 70.599,83.552 87.846,83.552
GND on GND (split plane): 89.49,20.51 20.51,20.51 20.51,89.49 89.49,89.49

## Other copper
SIG/GND:
  region net +5V: 25.527,41.402 21.336,41.402 21.336,42.672 25.527,42.672
  region net +5V: 41.275,85.598 38.989,85.598 38.354,84.963 38.354,82.677
  region net +5V: 38.354,80.645 44.45,80.645 44.831,81.026 44.831,88.773 44.45,89.154 42.418,89.154 42.037,88.773 42.037,86.36 38.354,82.677
  region net +3.3V: 43.975,48.166 44.577,48.768 43.259,48.768
  region net +3.3V: 86.995,46.482 86.995,47.244 79.375,47.244 78.994,47.625 78.994,48.641 78.613,49.022 76.454,49.022 76.2,48.768 76.2,46.736 76.454,46.482
  region net +3.3V: 48.387,73.787 48.387,80.264 41.275,80.264 36.957,80.264 36.322,79.629 36.322,77.47 38.481,75.311 41.021,75.311 41.021,74.803 42.037,73.787
  region net +3.3V: 32.385,51.562 32.385,53.594 33.782,53.594 33.782,51.562
  region net +3.3V: 31.75,52.705 31.75,54.61 28.321,54.61 28.321,52.705
  region net GND: 27.712,39.396 29.236,39.396 29.236,38.38 27.712,38.38
  region net GND: 27.686,42.545 29.21,42.545 29.21,41.529 27.686,41.529
  region net GND: 45.212,85.725 45.212,82.677 45.847,82.042 52.705,82.042 53.594,82.931 53.594,88.9 53.34,89.154 49.784,89.154 49.784,86.233 49.53,85.979 45.466,85.979
  region net NRST: 51.816,40.513 52.197,40.894 52.197,40.132
SIG/POW:
  region net PH0: 49.403,44.7 49.399,44.704 48.641,44.704 48.641,44.196 49.403,44.196
POWER (plane layer: these items are gaps in the copper):
  lines w0.127: 20,20 20,90 90,90 90,20 20,20
  lines w0.178: 21.971,40.767 22.86,39.878 25.019,39.878 32.512,32.385 46.863,32.385 57.912,21.336 85.979,21.336 89.408,24.765 89.408,68.707 86.411,71.704 69.139,71.704 61.849,78.994 53.594,78.994 50.419,78.994 45.593,83.82 45.593,88.138 45.085,88.646 42.291,88.646 41.529,87.884 38.862,87.884 37.973,86.995 37.973,80.518 38.1,80.391 42.418,80.391 45.466,77.343 45.974,77.343 53.594,69.723 83.693,69.723 84.201,69.215 84.201,66.802 82.55,65.151 82.55,58.928 84.201,57.277 84.201,54.356 85.09,53.467 86.614,53.467 87.376,52.705 87.376,50.673 85.598,48.895 85.598,41.91 84.836,41.148 84.836,38.862 82.55,36.576 82.55,30.48 83.693,29.337 84.709,29.337 85.598,28.448 85.598,27.051 85.09,26.543 70.104,26.543 66.675,29.972 66.675,31.623 65.278,33.02 63.5,33.02 60.96,35.56 54.102,35.56 51.435,38.227 39.878,38.227 27.686,50.419 27.686,56.388 31.623,60.325 31.623,69.85 31.242,70.231 27.686,70.231 25.908,68.453 24.765,67.31 24.765,48.514 21.971,45.72 21.971,40.767 ; 68.453,73.965 69.901,72.517 83.49,72.517 84.836,73.863 84.836,76.581 86.487,78.232 88.011,78.232 88.519,78.74 88.519,83.007 87.884,83.642 70.561,83.642 68.453,81.534 68.453,73.965
GND (plane layer: these items are gaps in the copper):
  the board outline again, w0.127

## Silkscreen, mask and mechanical layers (free items; w line width, h text height)
Top Overlay:
  text "RST" at 59.182,27.432 h1.02
Bottom Overlay:
  text "+5V" at 54.864,79.553 h1.02
  text "+12V" at 71.628,79.299 h1.02
Drill Drawing:
  lines w0.127: 70,20 20,20 ; 20,20 90,20 90,90 20,90 20,70 20,20

## Text inside footprints (layer, text, board x,y; h text height)
CARD2: Bottom Overlay "OUT-" at 58.089,85.826 h1.02; Bottom Overlay "OUT+" at 57.962,75.103 h1.02; Bottom Overlay "IN-" at 68.249,85.826 h1.02; Bottom Overlay "IN+" at 68.249,75.103 h1.02